# Altium PCB RADAR_D79_POWER_24V_v0.8.0_R9_NATIVE.PcbDoc (part 1 of 7)
Units mil, origin at the board's own origin, x right, y up, seen from the top; angles counter-clockwise.
Board outline 3110.24 x 3110.24 mil, 8 copper layers (Top Layer, GND1, SIG1, PWR1, PWR2, SIG2, GND2, Bottom Layer), stack 55.2 mil thick; 304 components, 269 nets, 1408 pads, 1366 vias.
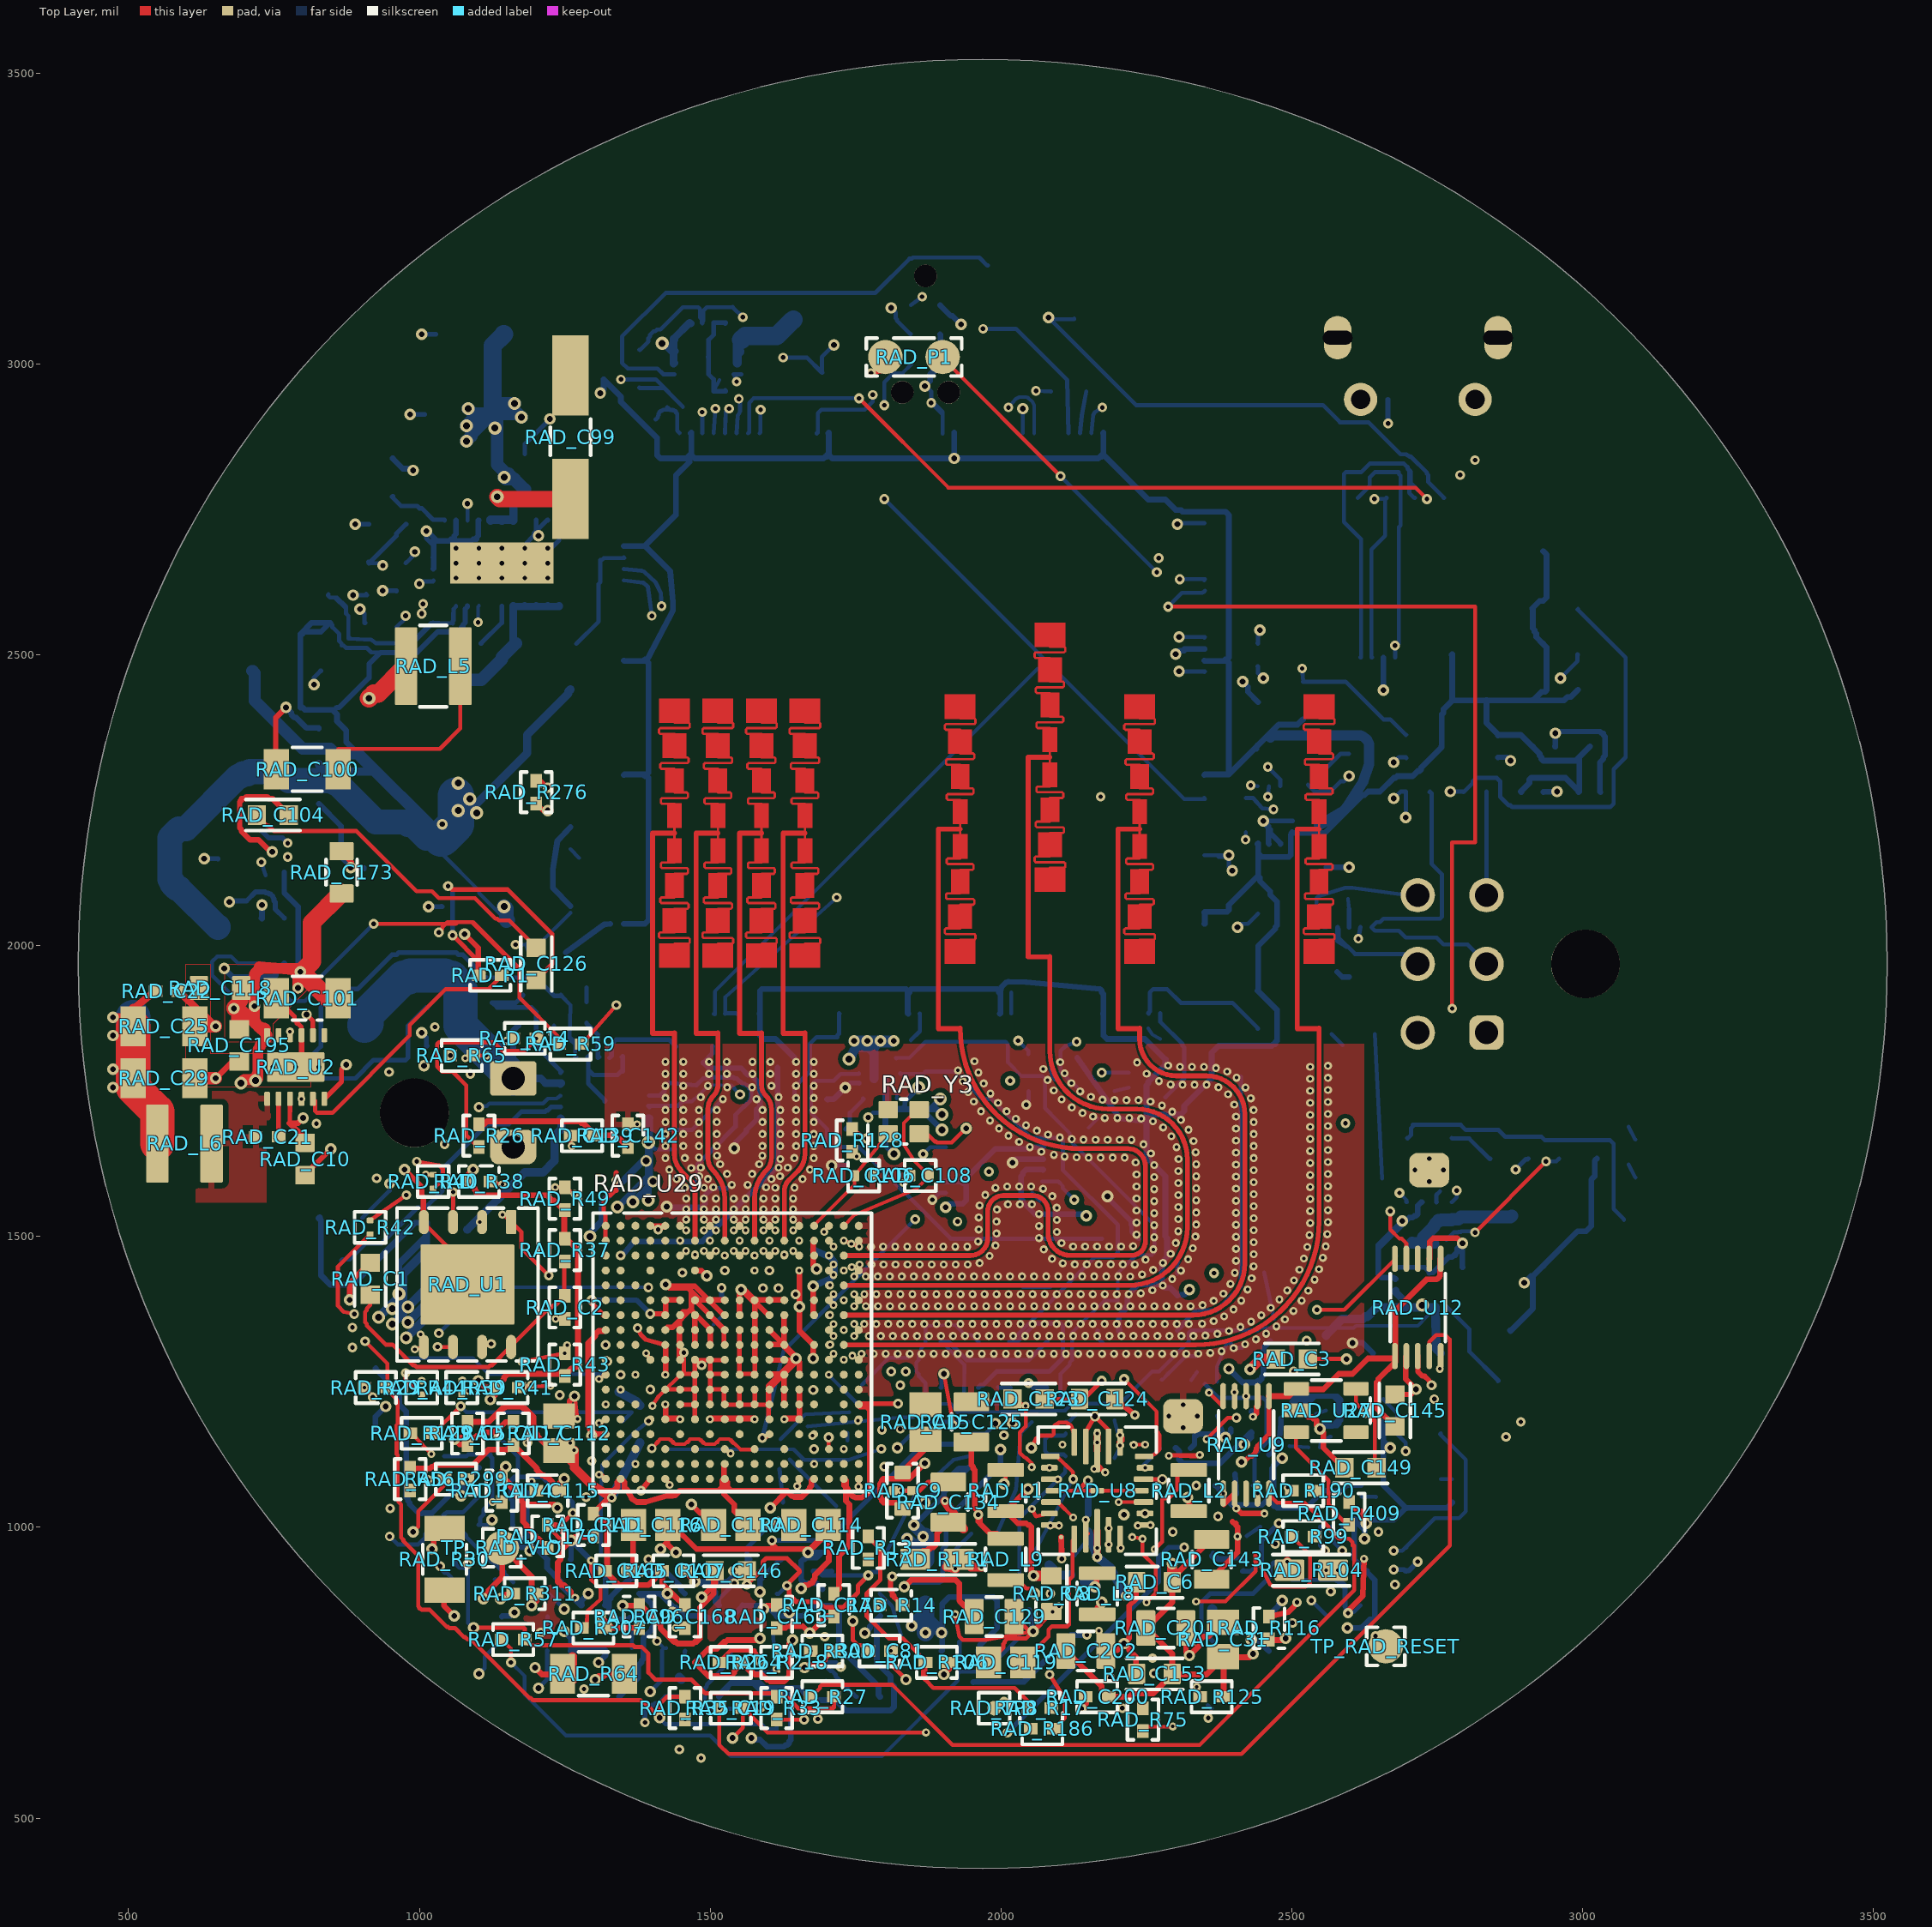
[diagram p0: Top Layer view]
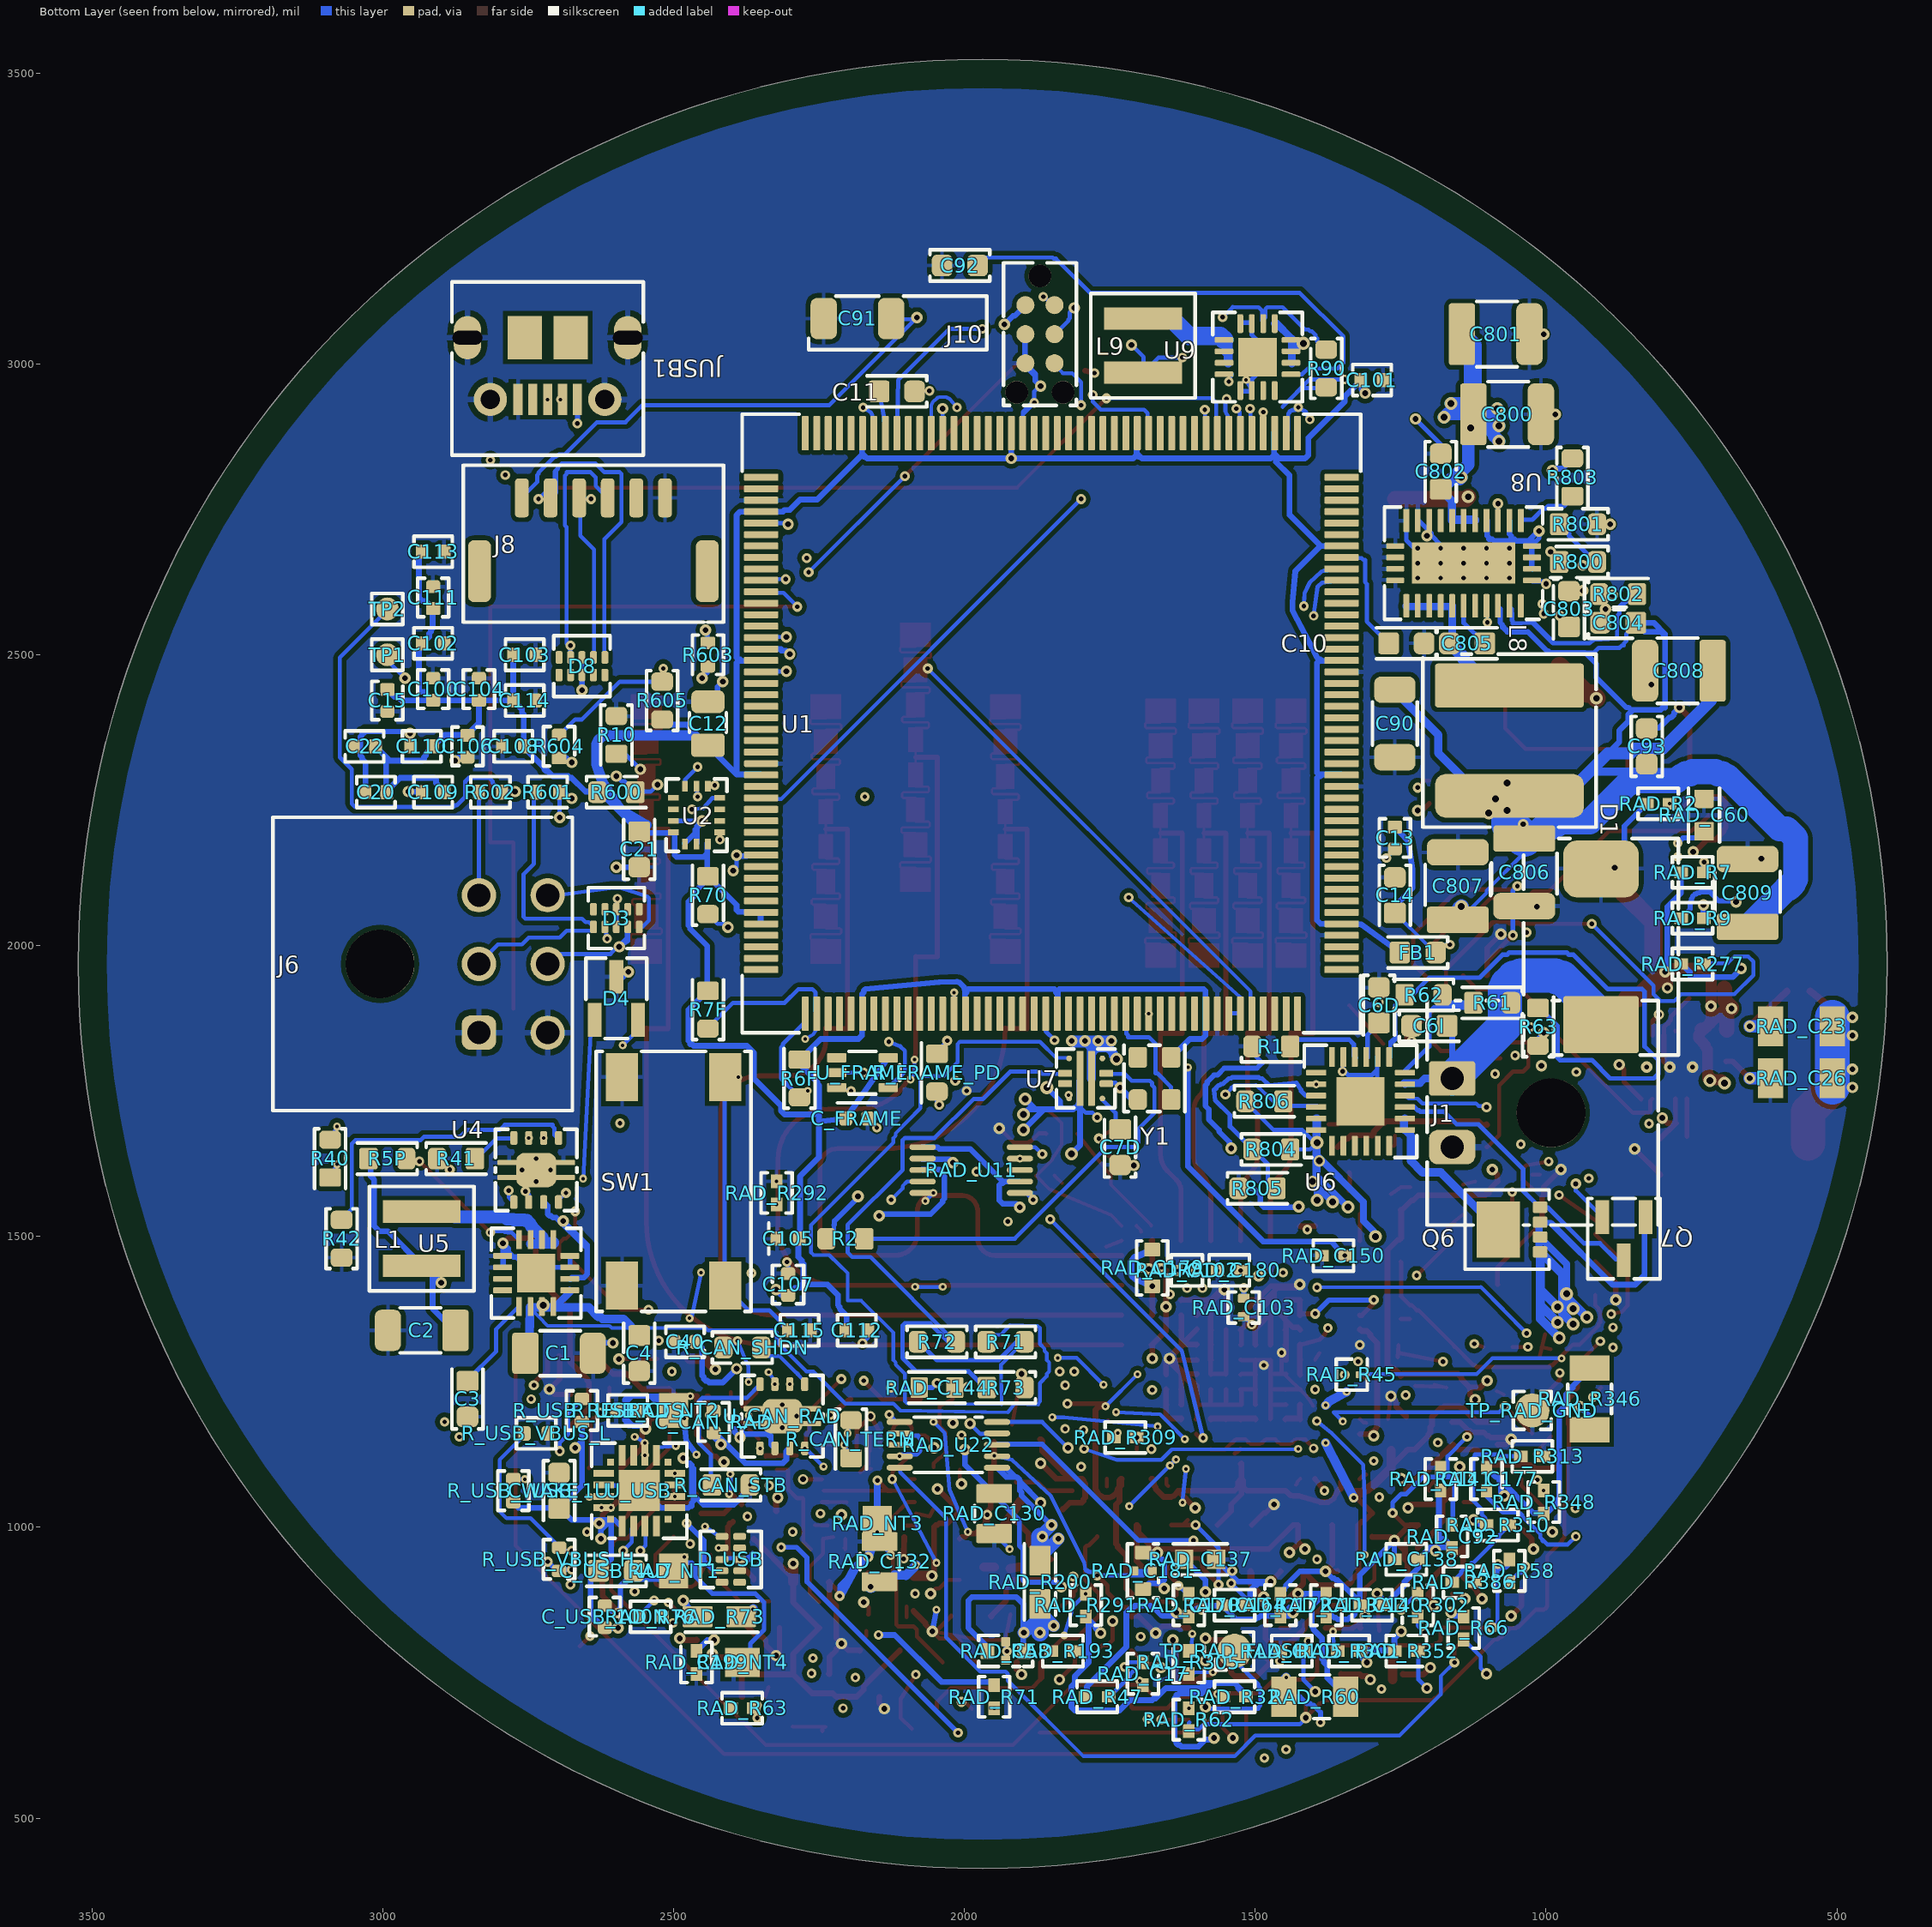
[diagram p1: Bottom Layer view, seen from below]
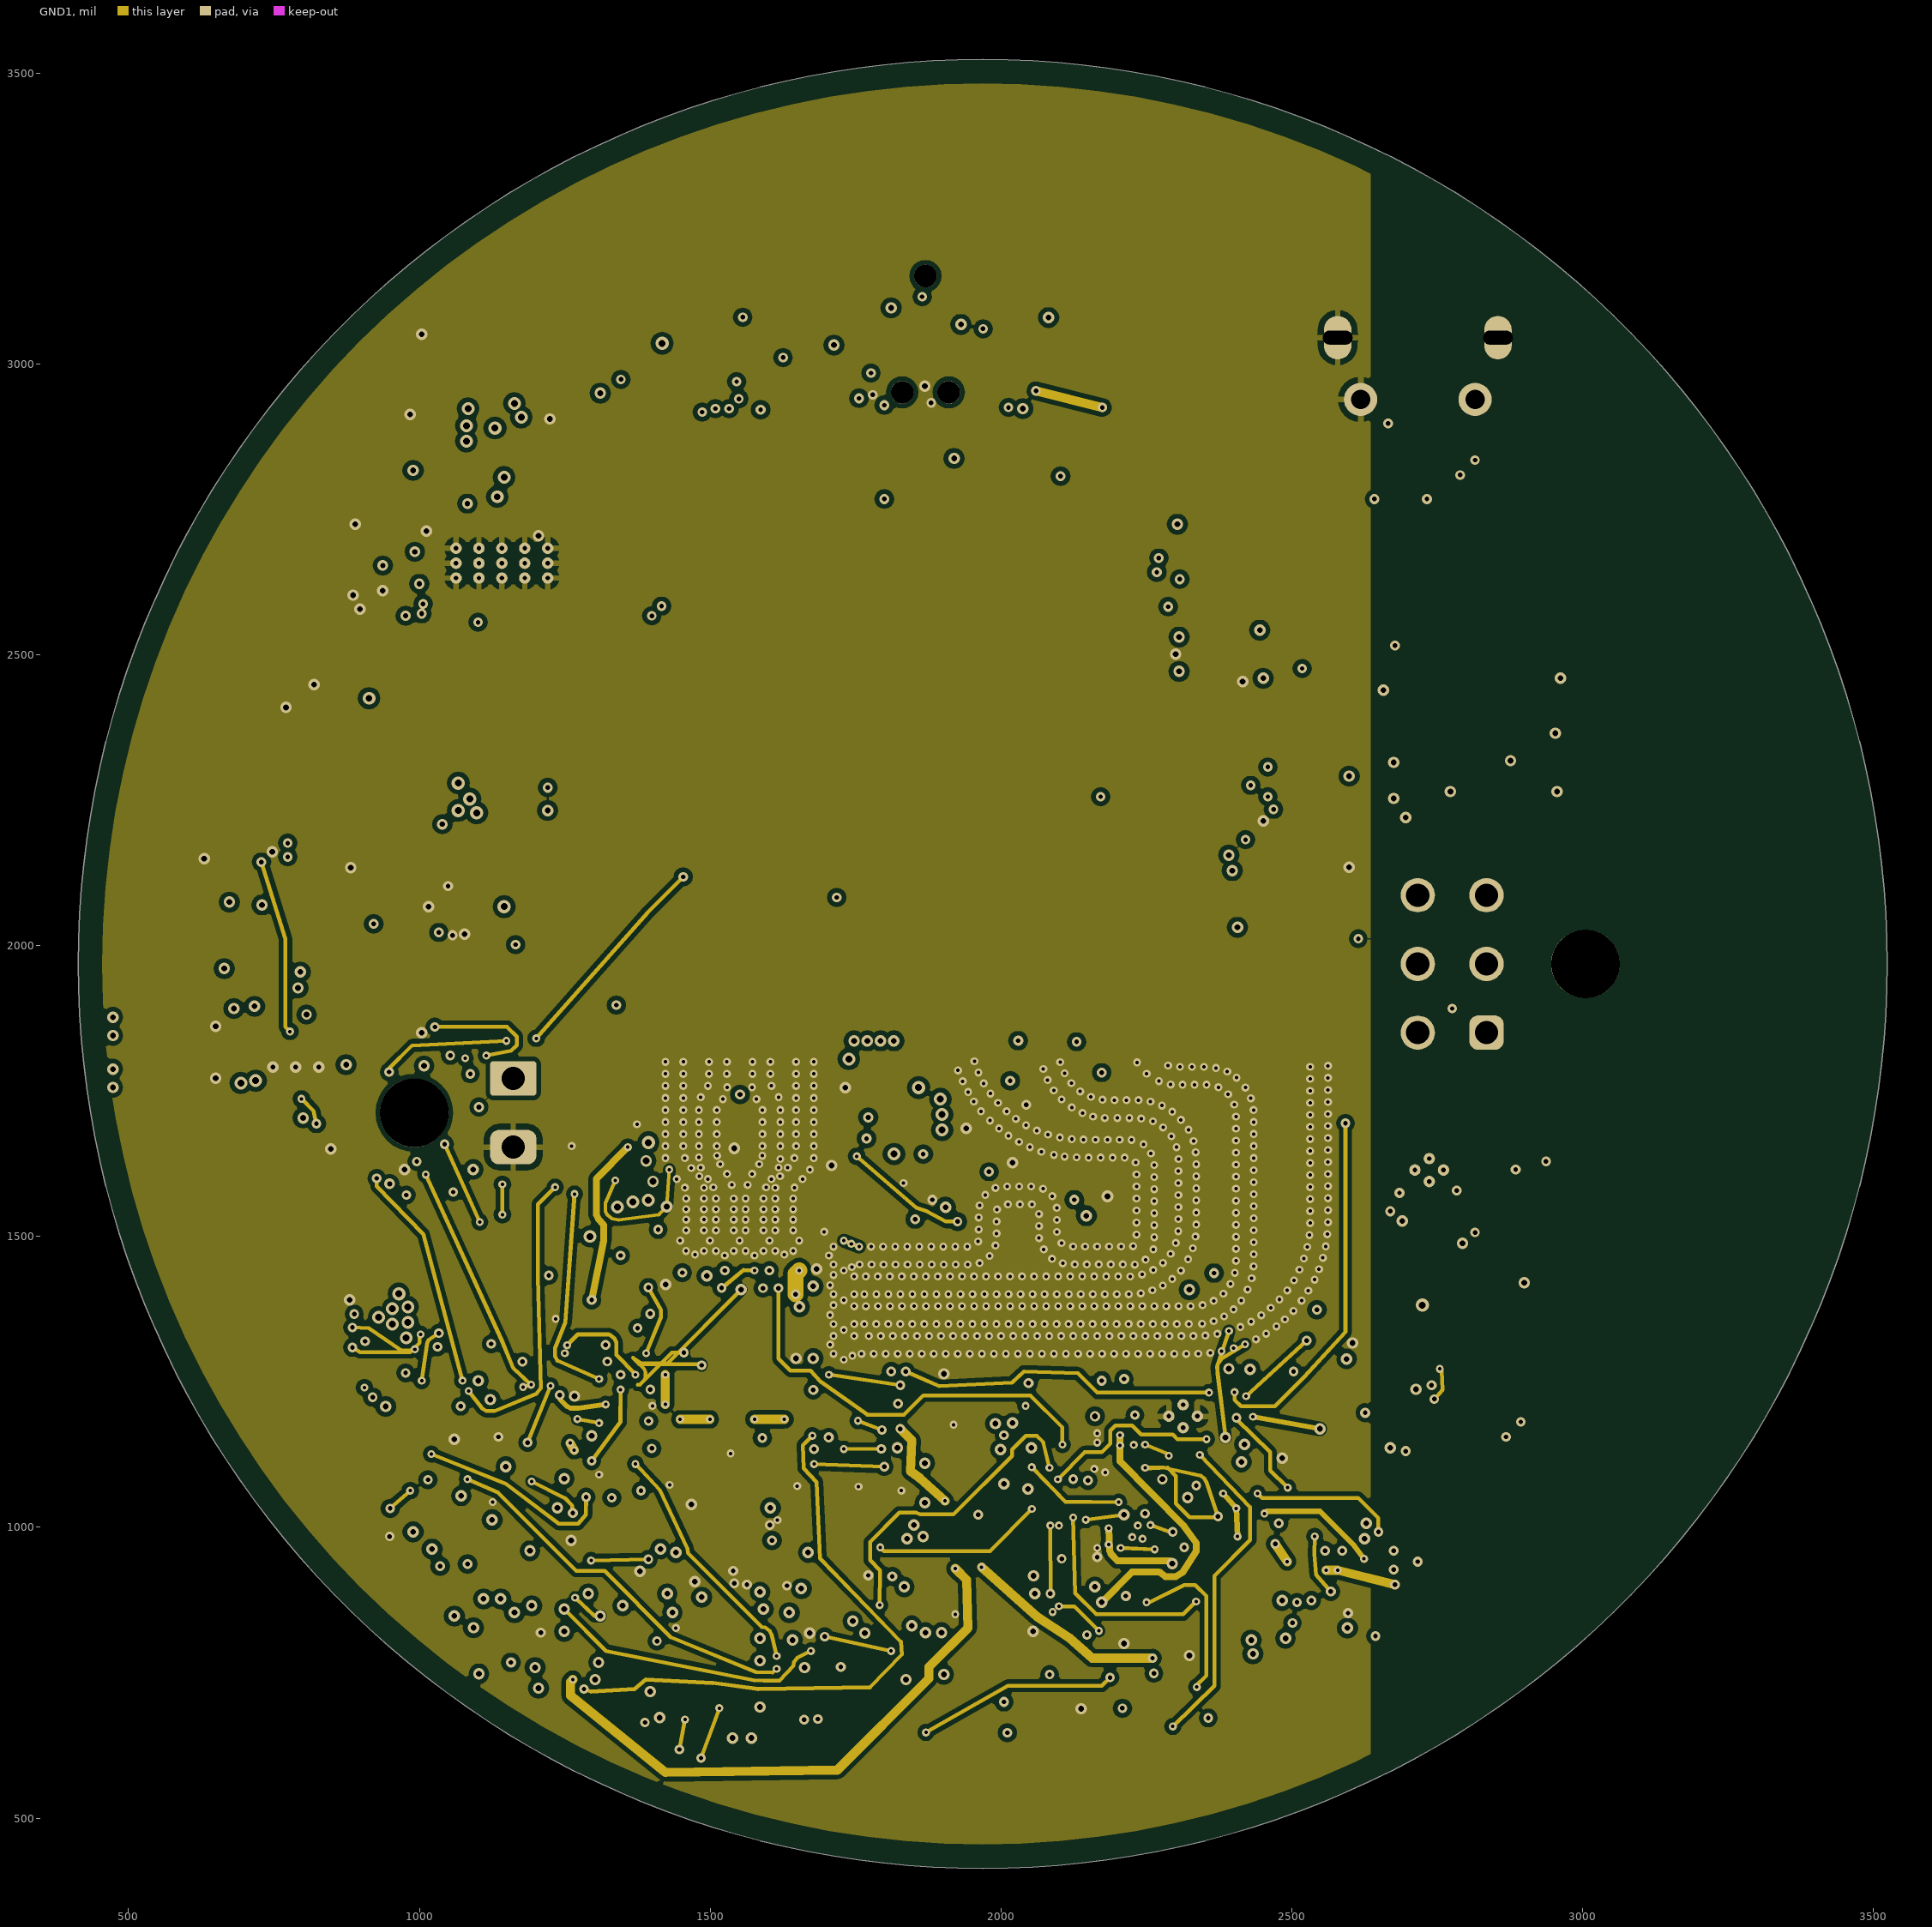
[diagram p2: GND1]
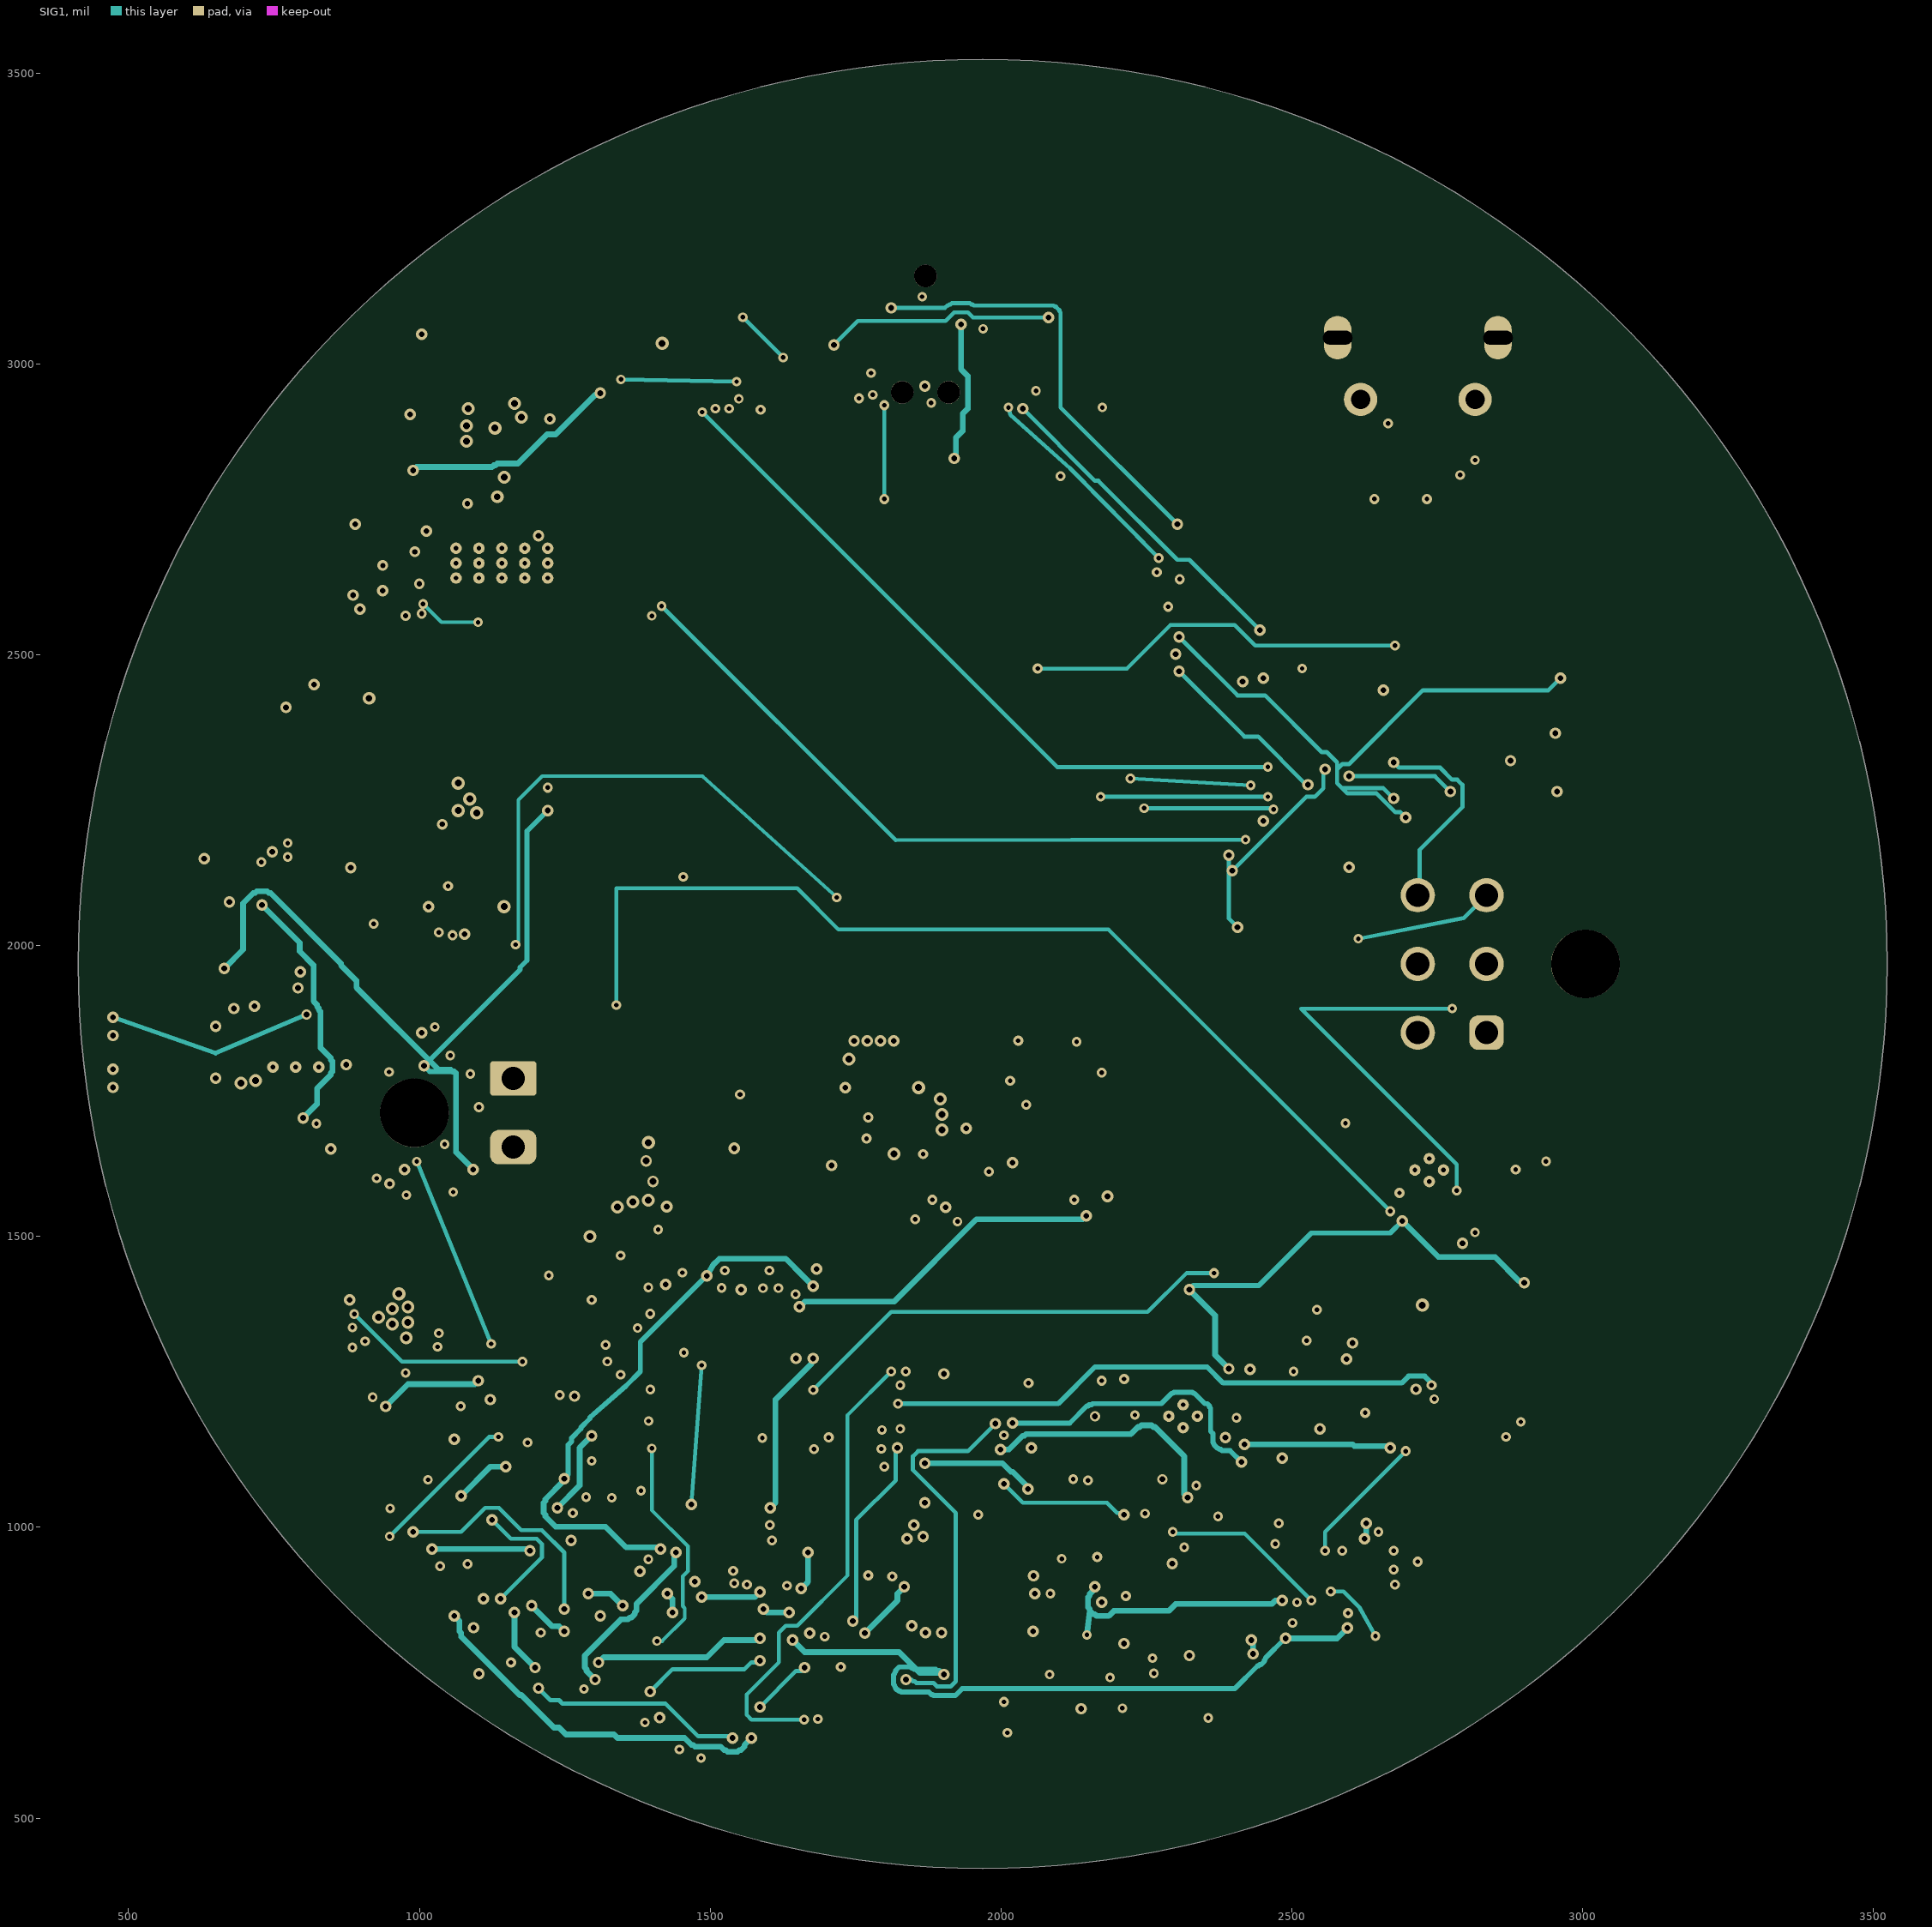
[diagram p3: SIG1]
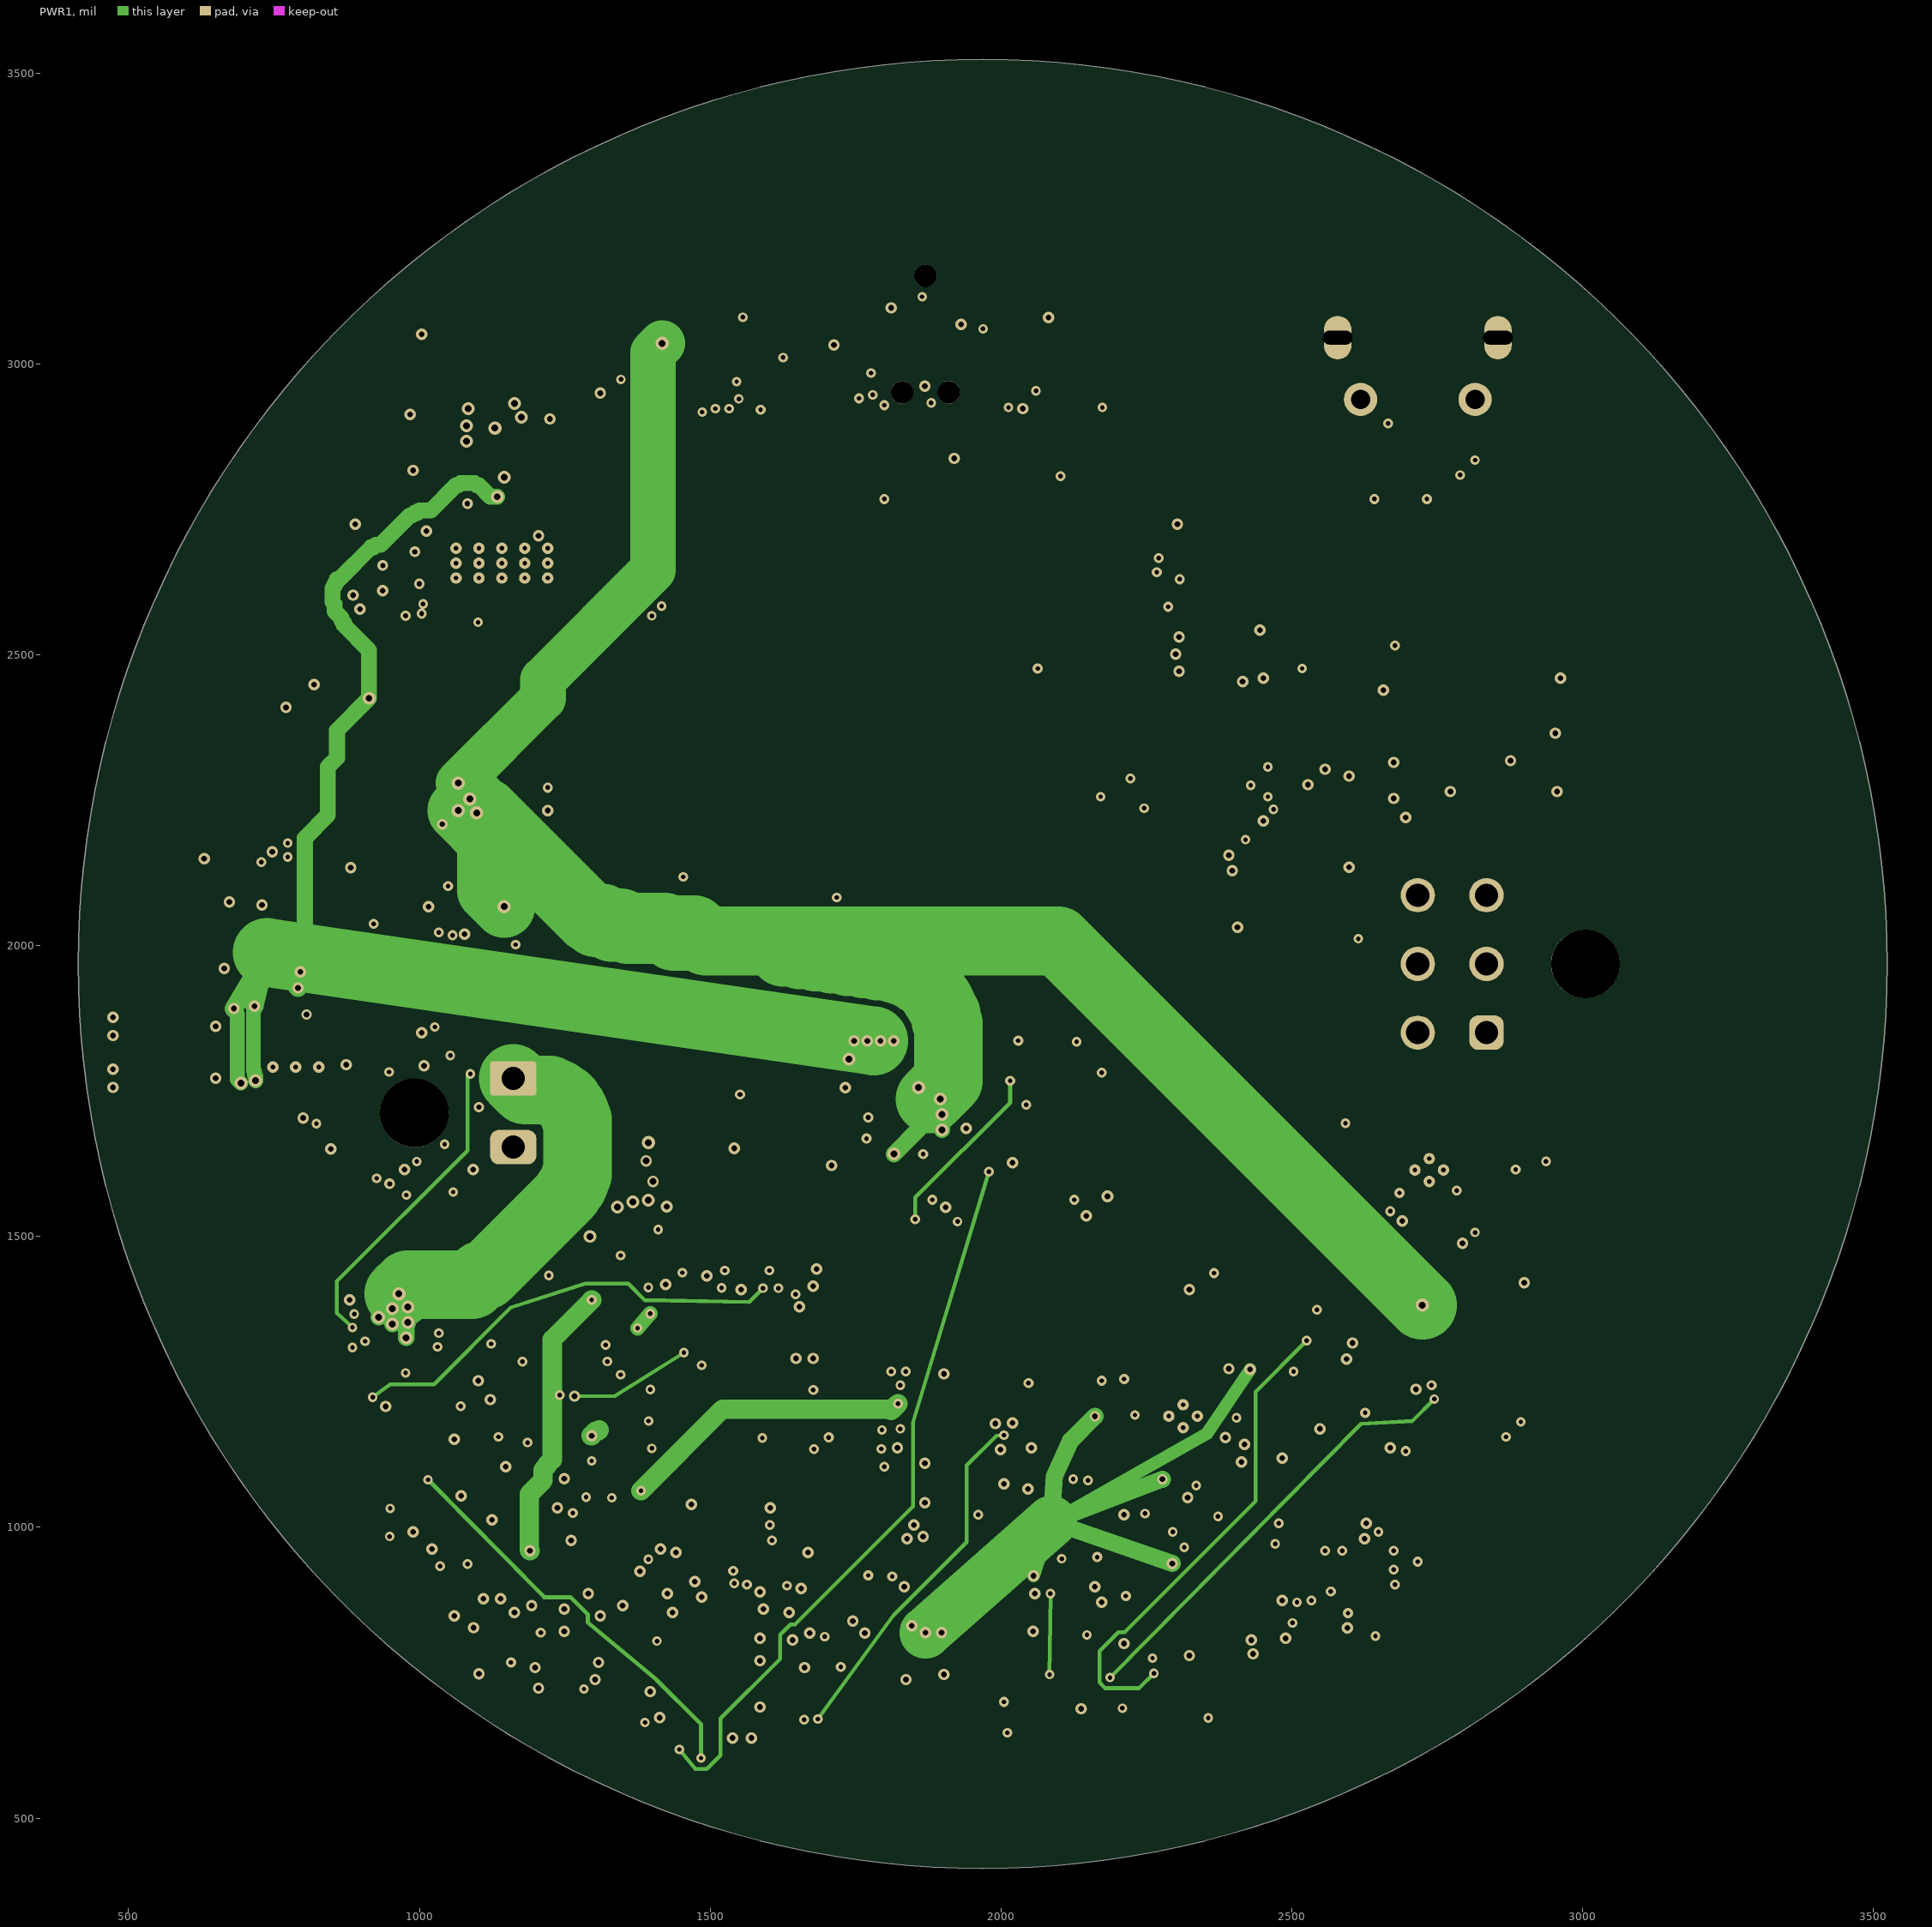
[diagram p4: PWR1]
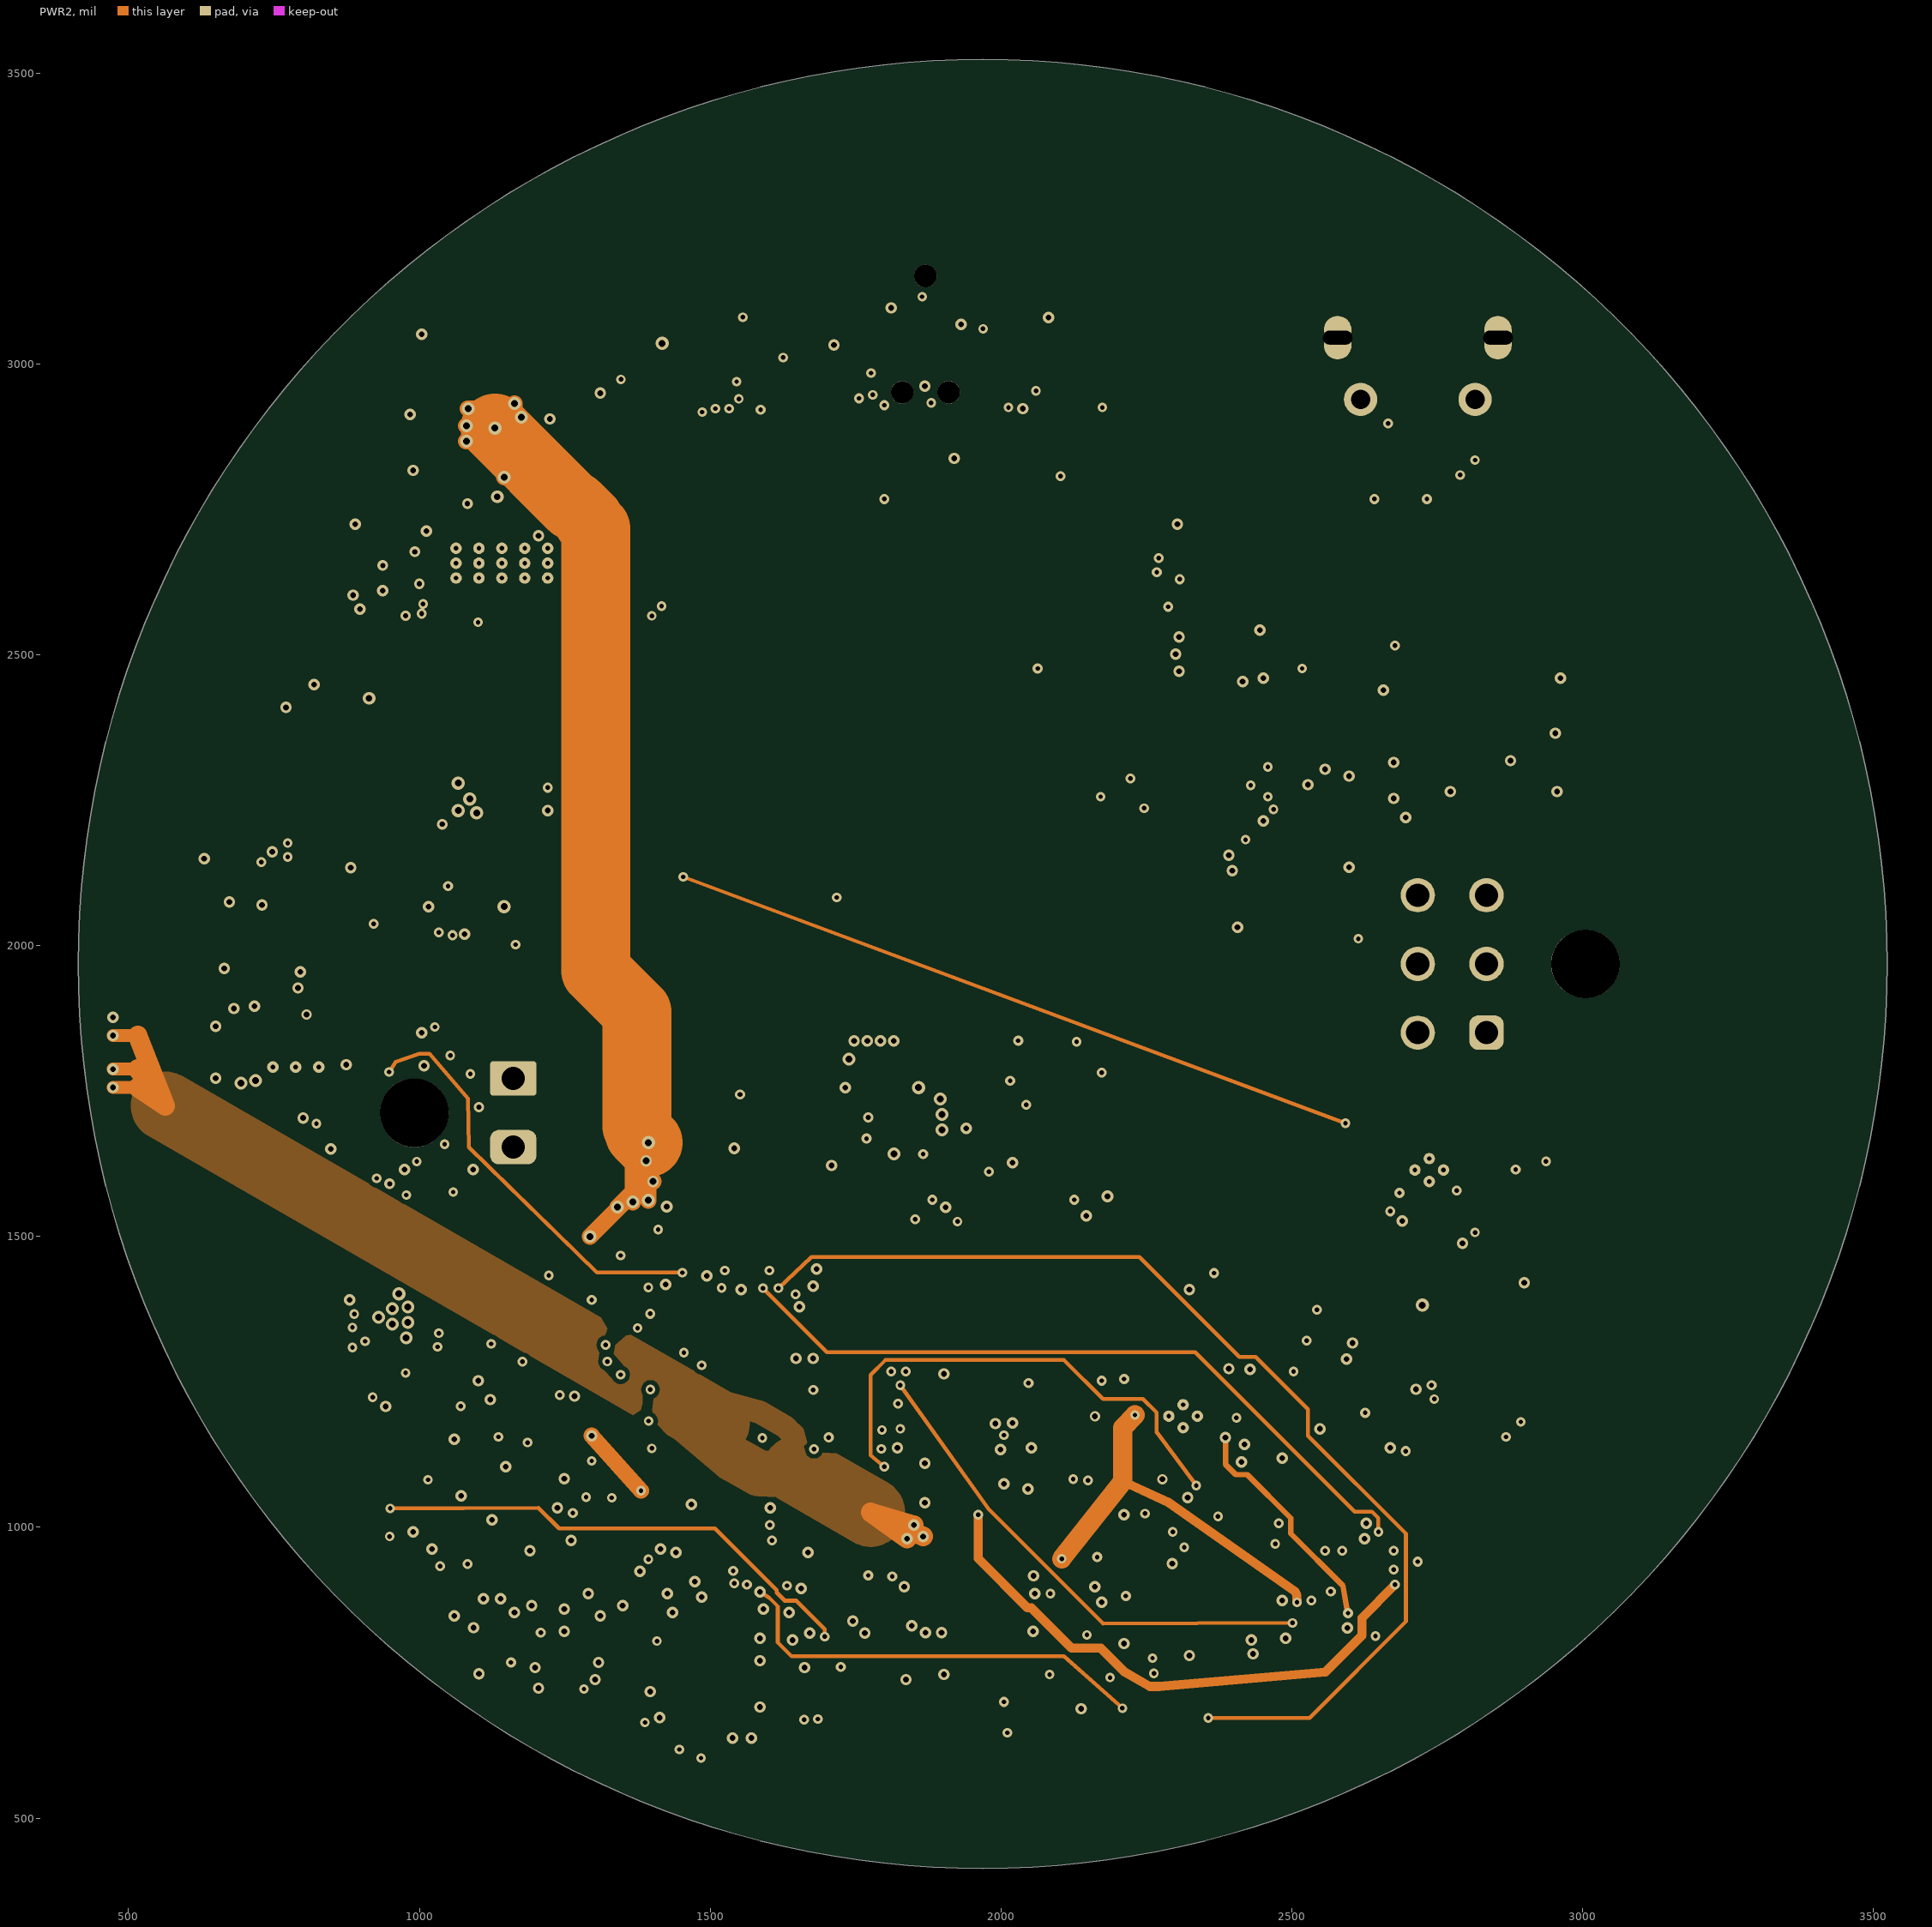
[diagram p5: PWR2]
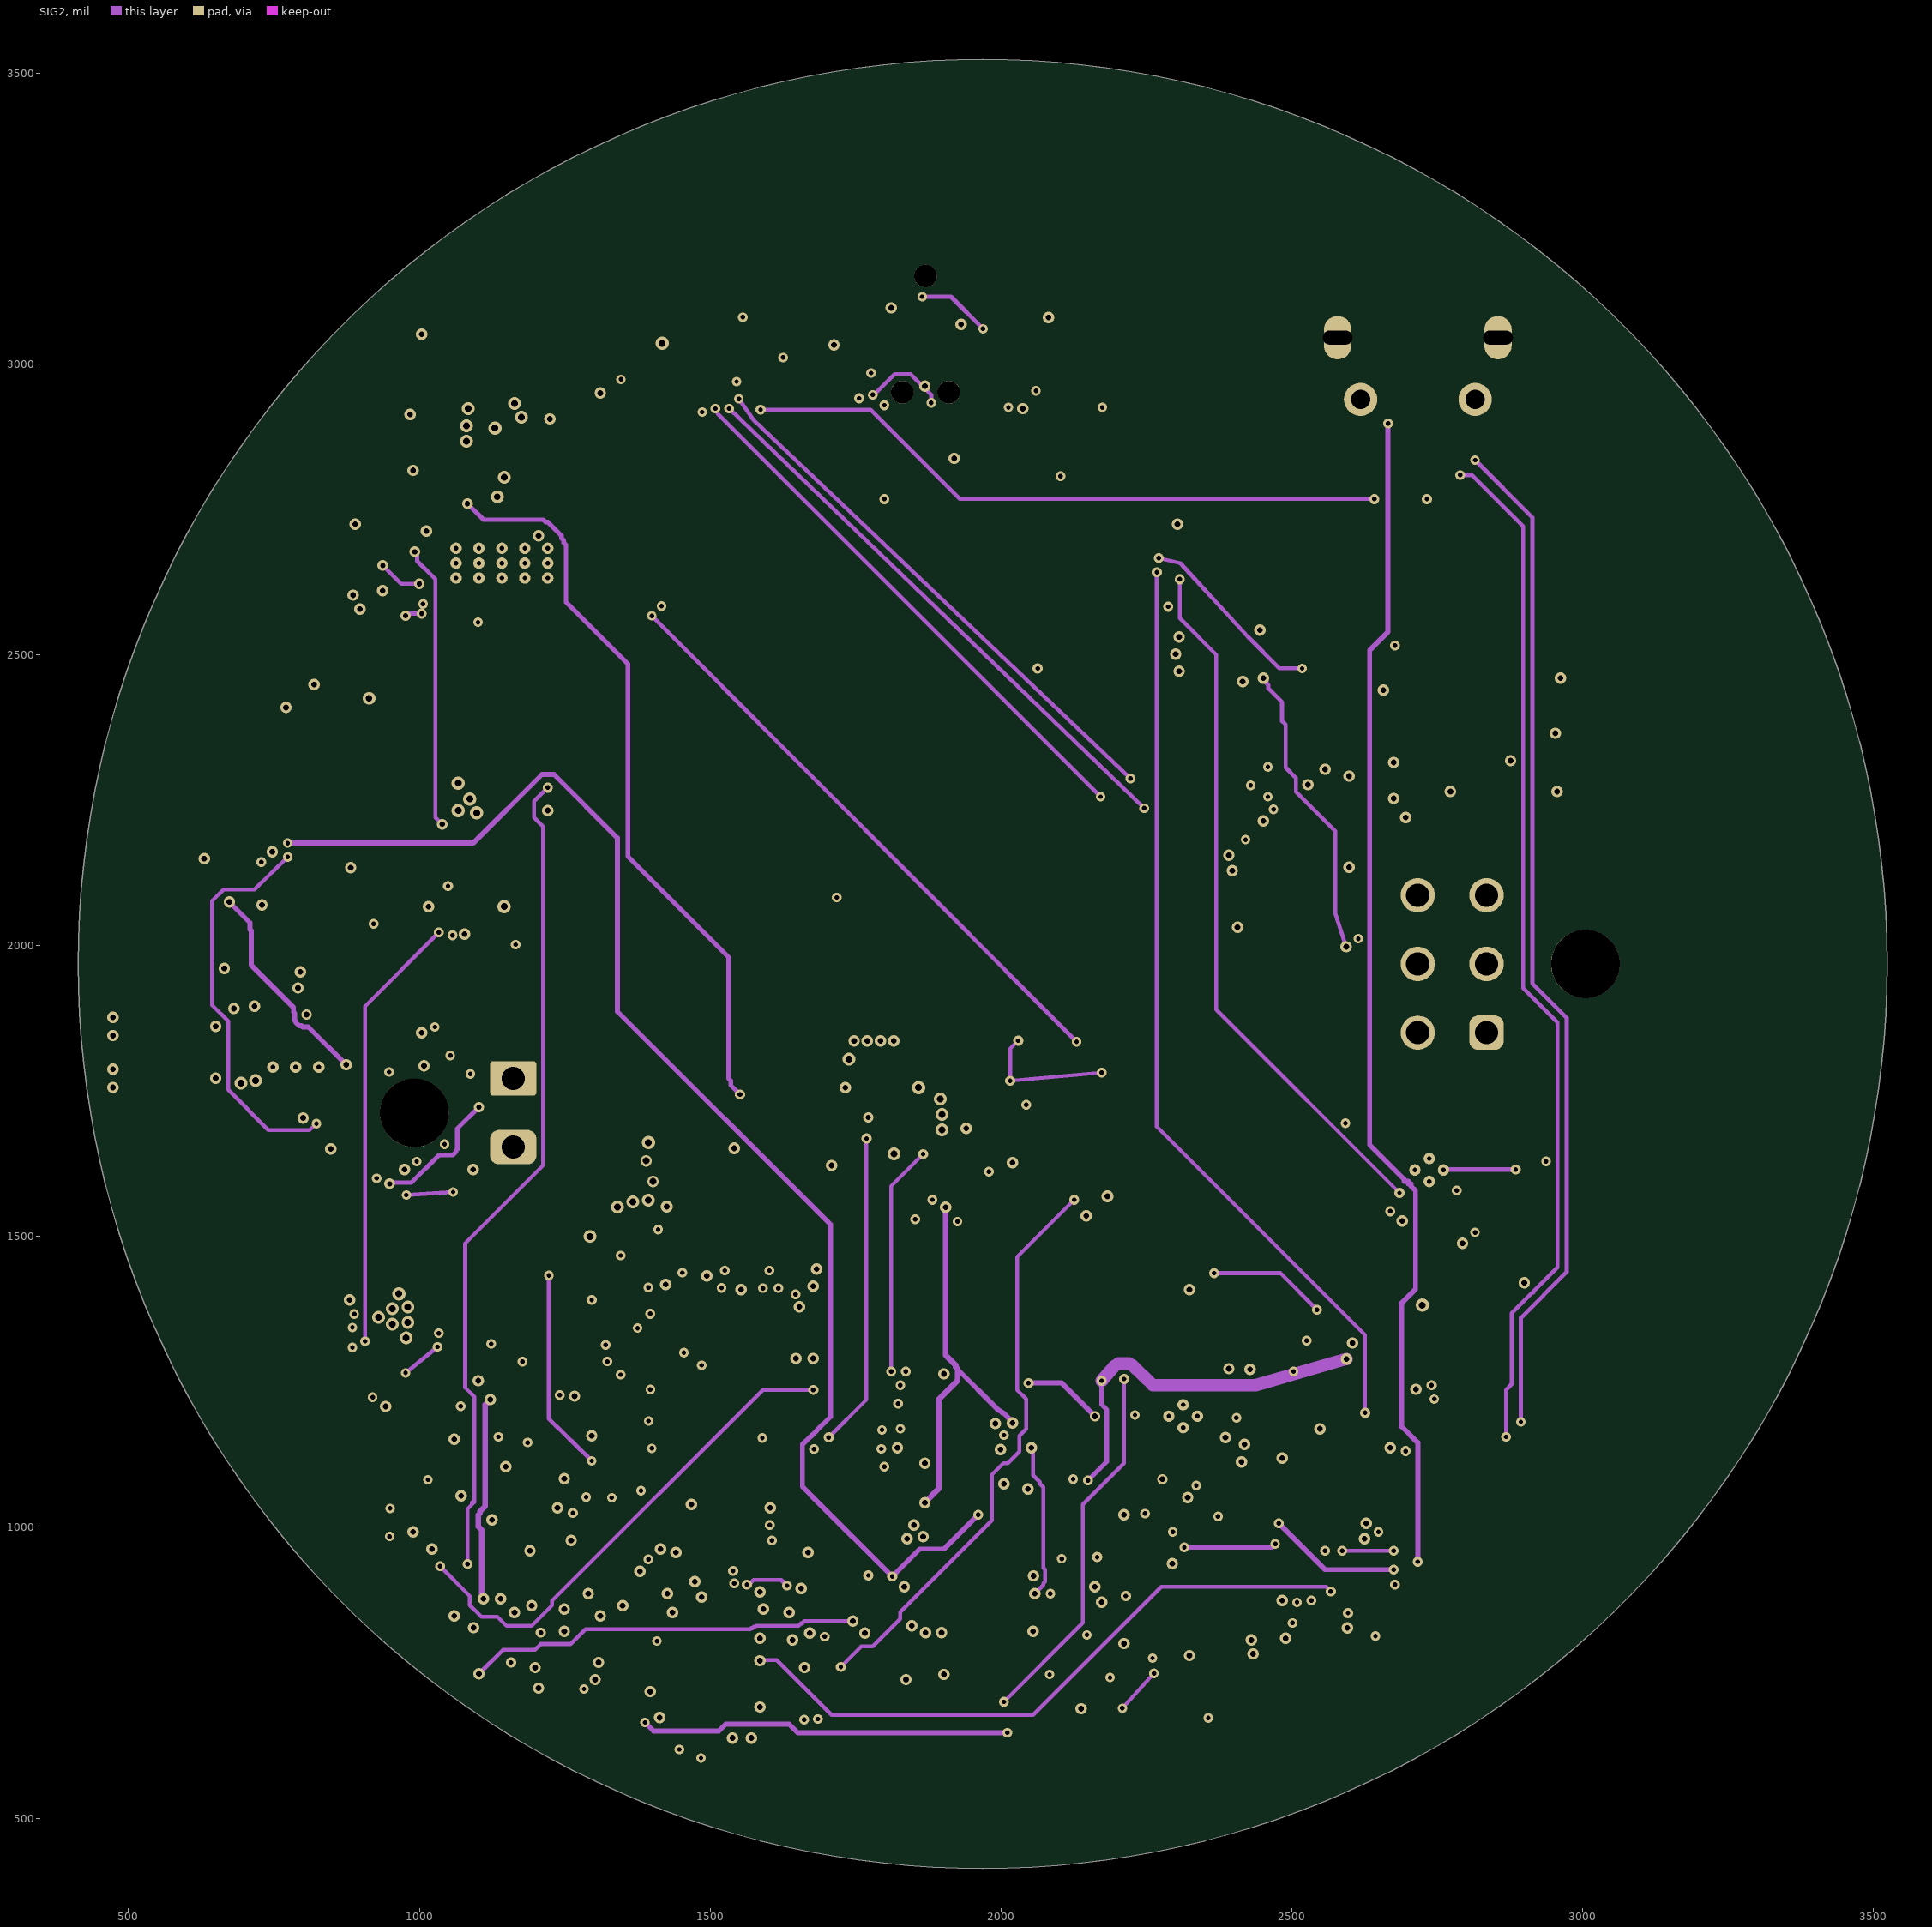
[diagram p6: SIG2]
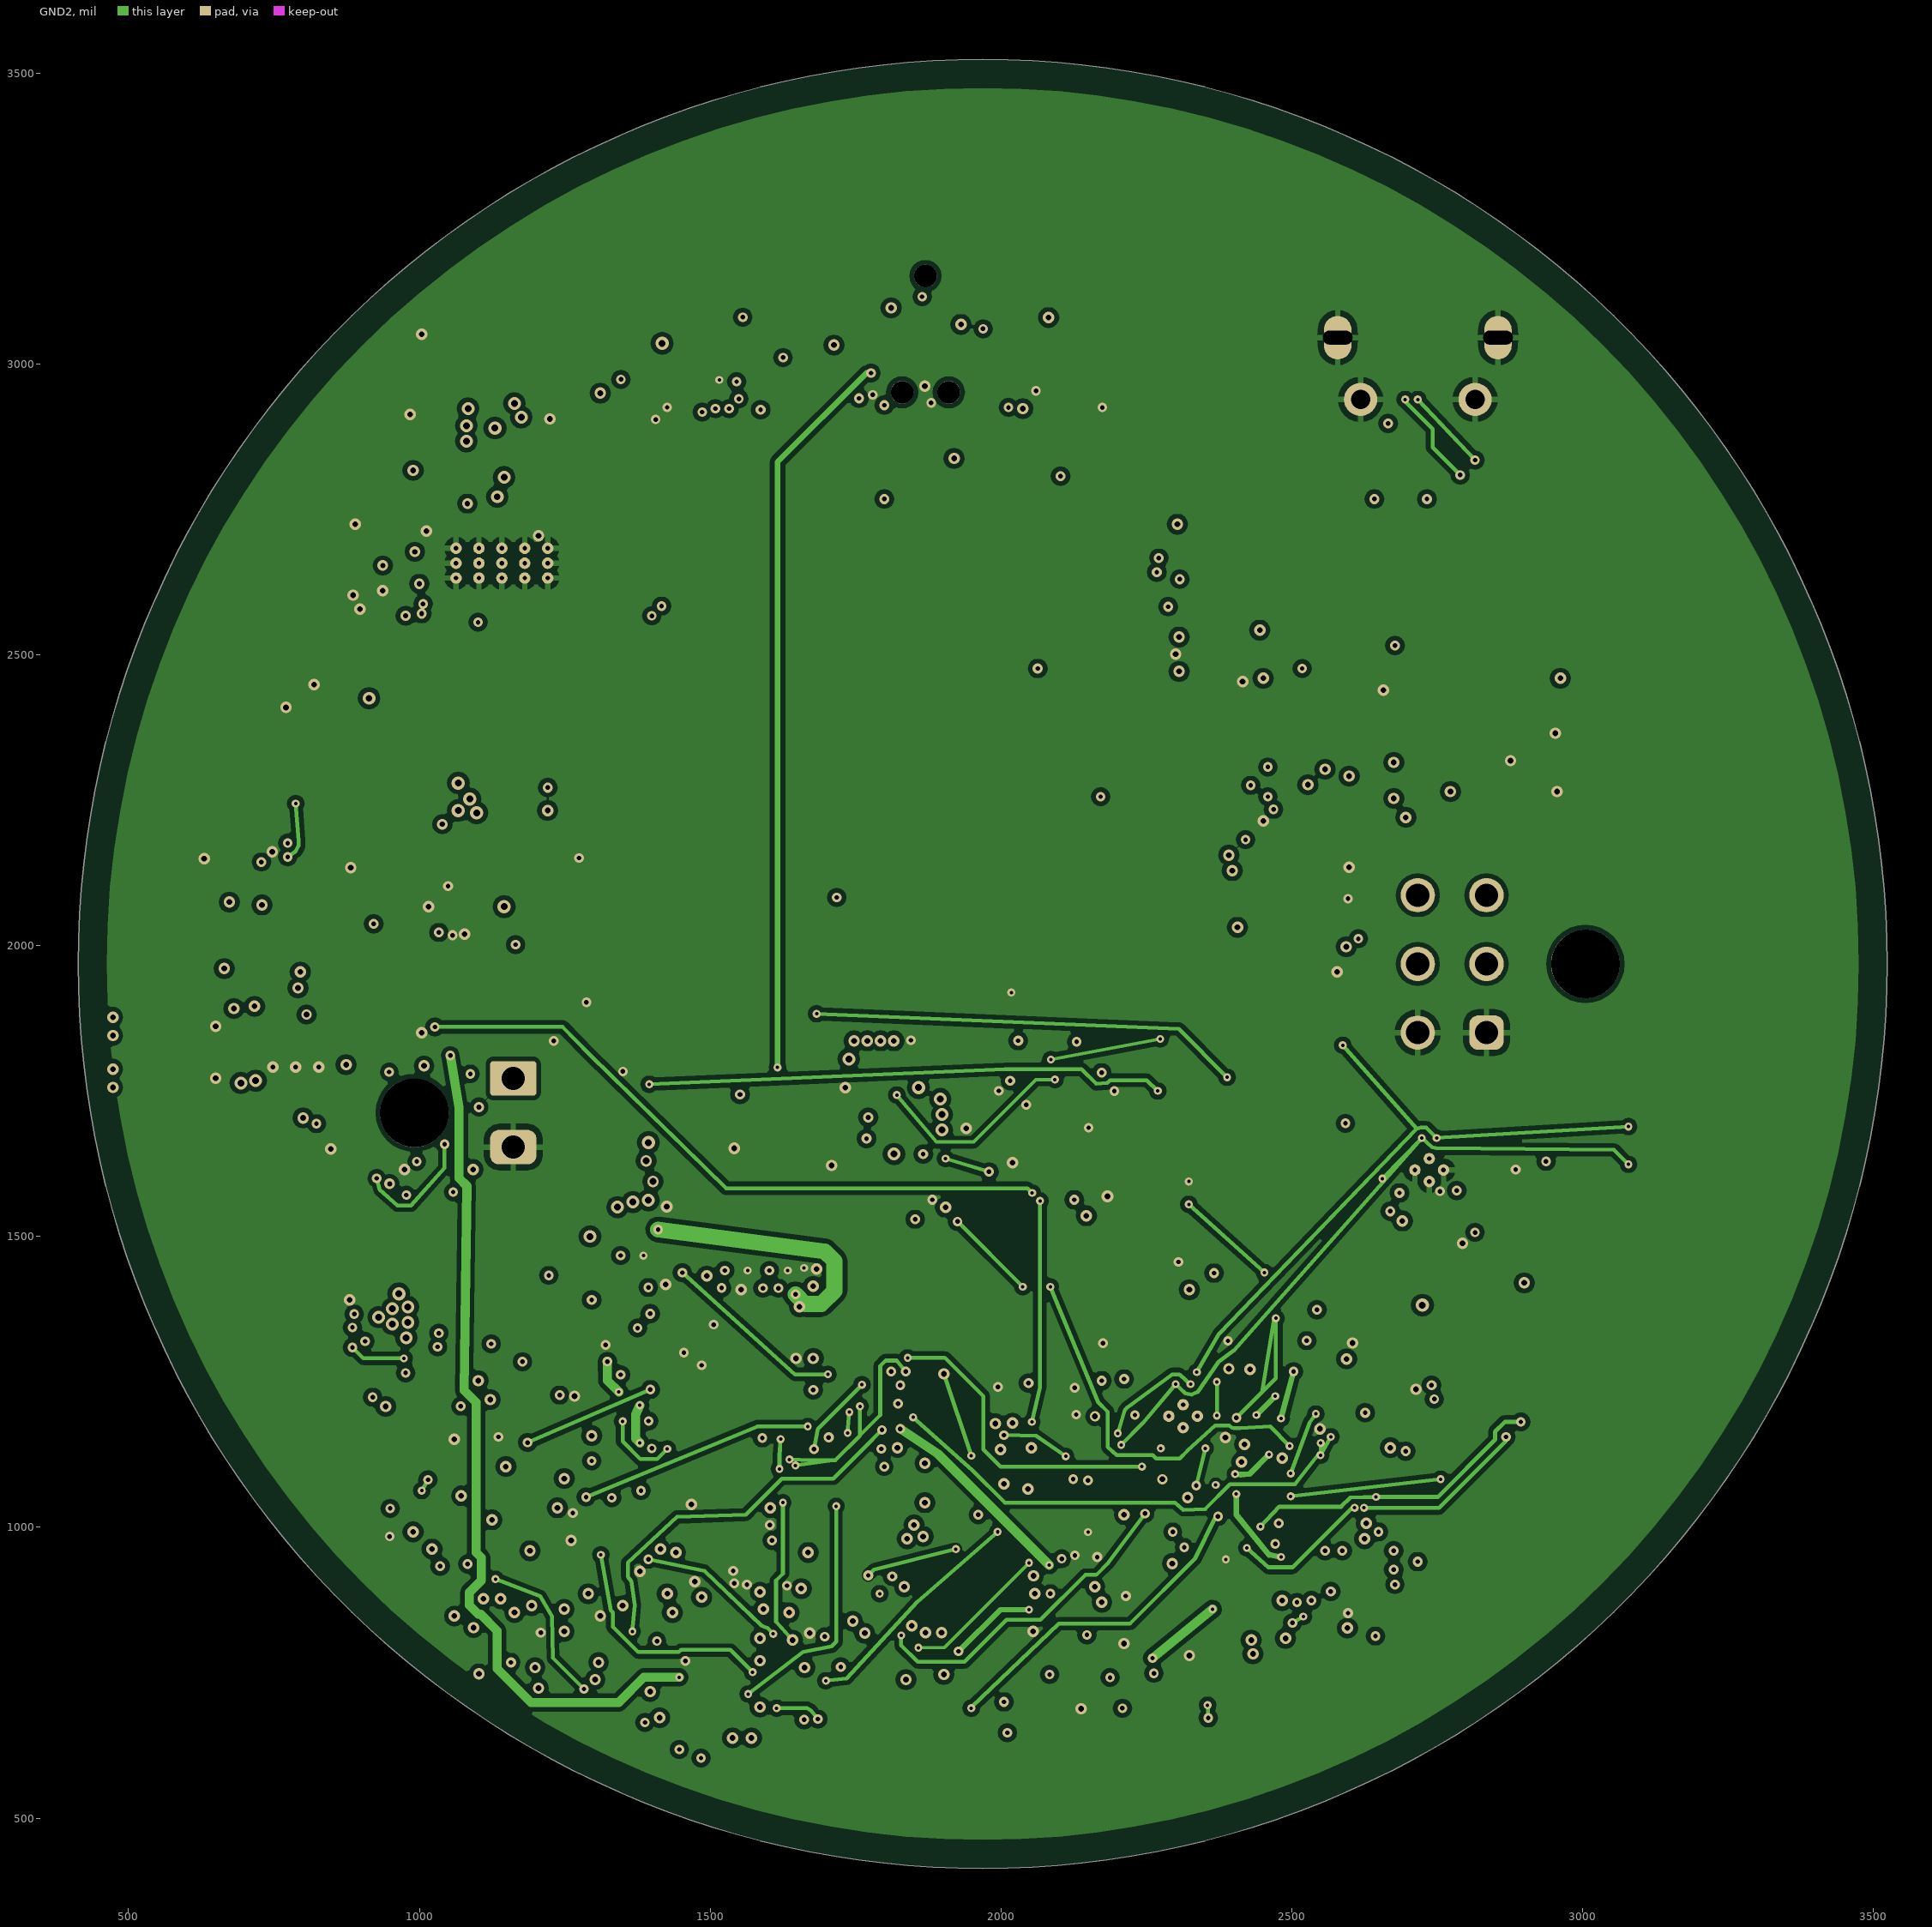
[diagram p7: GND2]

## Layer stack, top to bottom
Top Solder: solder mask 0.8, Solder Resist, Dk 3.5
Top Layer: signal copper 1.6
Dielectric 1: prepreg 5, RO3003, Dk 3
GND1: signal copper 1.4
Dielectric 2: core 5, FR-4 High Tg, Dk 4.04
SIG1: signal copper 0.7
Dielectric 3: prepreg 10, FR-4 High Tg, Dk 4.04
PWR1: signal copper 1.4
Dielectric 4: prepreg 5, FR-4 High Tg, Dk 4.04
PWR2: signal copper 1.4
Dielectric 5: prepreg 10, FR-4 High Tg, Dk 4.04
SIG2: signal copper 0.7
Dielectric 6: core 5, FR-4 High Tg, Dk 4.04
GND2: signal copper 1.4
Dielectric 7: prepreg 5, FR-4 High Tg, Dk 4.04
Bottom Layer: signal copper 1.6
Bottom Solder: solder mask 0.8, Solder Resist, Dk 3.5

## Board outline
1968.5,413.39 cw(c1968.5,1968.5) 413.39,1968.5 cw(c1968.5,1968.5) 1968.5,3523.62 cw(c1968.5,1968.5) 3523.62,1968.5 cw(c1968.5,1968.5)

## Design rules (kind name [scope] priority, off if disabled: settings)
Clearance PROC194A_RF_TOP_TO_GND_VIA [OnLayer('Top Layer') AND (IsTrack OR IsArc) AND (InNet('TI_TX1') OR InNet('TI_TX2') OR InNet('TI_TX3') OR InNet('TI_TX4') OR InNet('TI_RX1') OR InNet('TI_RX2') OR InNet('TI_RX3') OR InNet('TI_RX4')) vs IsVia AND InNet('GND')] p1: gap=10 ignorepadtopadclearanceinfootprint=FALSE except(4: Arc-Via Arc-Hole Track-Via Track-Hole) // TI PROC194A RF_Via matrix, track and arc to GND via only
Clearance PROC194A_RF_Coplanar_Gap [OnLayer('Top Layer') AND (IsTrack OR IsArc) AND (InNet('TI_TX1') OR InNet('TI_TX2') OR InNet('TI_TX3') OR InNet('TI_TX4') OR InNet('TI_RX1') OR InNet('TI_RX2') OR InNet('TI_RX3') OR InNet('TI_RX4')) vs InNamedPolygon('GND_COPLANAR_FEED_REFERENCE')] p2: gap=10 ignorepadtopadclearanceinfootprint=FALSE except(3.78: Track-Poly; 3.94: Arc-Poly) // TI PROC194A clearances, feed tracks and arcs to named coplanar ground
Clearance PROC194A_RF_TO_RF_CLEARANCE [OnLayer('Top Layer') AND (IsTrack OR IsArc) AND (InNet('TI_RX1') OR InNet('TI_RX2') OR InNet('TI_RX3') OR InNet('TI_RX4') OR InNet('TI_TX1') OR InNet('TI_TX2') OR InNet('TI_TX3') OR InNet('TI_TX4')) vs OnLayer('Top Layer') AND (IsTrack OR IsArc) AND (InNet('TI_RX1') OR InNet('TI_RX2') OR InNet('TI_RX3') OR InNet('TI_RX4') OR InNet('TI_TX1') OR InNet('TI_TX2') OR InNet('TI_TX3') OR InNet('TI_TX4'))] p3: gap=4.5 ignorepadtopadclearanceinfootprint=FALSE // Controlled antenna-array inter-channel spacing
Clearance Hybrid_35um_Polygon_Clearance [InPolygon] p4: gap=7.87 ignorepadtopadclearanceinfootprint=FALSE
Clearance [All] p5: gap=5.91 ignorepadtopadclearanceinfootprint=FALSE
DiffPairsRouting [All] p1: maxlimit=10 minlimit=10 mostfreqgap=10 toplayer_minwidth=15 toplayer_maxwidth=15 toplayer_prefwidth=15 midlayer2_minwidth=15 midlayer2_maxwidth=15 midlayer2_prefwidth=15 midlayer3_minwidth=15 midlayer3_maxwidth=15 midlayer3_prefwidth=15 midlayer5_minwidth=15 midlayer5_maxwidth=15 midlayer5_prefwidth=15 midlayer6_minwidth=15 midlayer6_maxwidth=15 midlayer6_prefwidth=15 midlayer7_minwidth=15 midlayer7_maxwidth=15 midlayer7_prefwidth=15 midlayer8_minwidth=15 midlayer8_maxwidth=15 midlayer8_prefwidth=15 bottomlayer_minwidth=15 bottomlayer_maxwidth=15 bottomlayer_prefwidth=15 substack1={9319A519-0D26-40B3-8AF8-C4998BECF1C7} toplayer_{9319a519-0d26-40b3-8af8-c4998becf1c7}_minwidth=15 toplayer_{9319a519-0d26-40b3-8af8-c4998becf1c7}_maxwidth=15 toplayer_{9319a519-0d26-40b3-8af8-c4998becf1c7}_prefwidth=15 midlayer2_{9319a519-0d26-40b3-8af8-c4998becf1c7}_minwidth=15 midlayer2_{9319a519-0d26-40b3-8af8-c4998becf1c7}_maxwidth=15 midlayer2_{9319a519-0d26-40b3-8af8-c4998becf1c7}_prefwidth=15 midlayer3_{9319a519-0d26-40b3-8af8-c4998becf1c7}_minwidth=15 midlayer3_{9319a519-0d26-40b3-8af8-c4998becf1c7}_maxwidth=15 midlayer3_{9319a519-0d26-40b3-8af8-c4998becf1c7}_prefwidth=15 midlayer5_{9319a519-0d26-40b3-8af8-c4998becf1c7}_minwidth=15 midlayer5_{9319a519-0d26-40b3-8af8-c4998becf1c7}_maxwidth=15 midlayer5_{9319a519-0d26-40b3-8af8-c4998becf1c7}_prefwidth=15 midlayer6_{9319a519-0d26-40b3-8af8-c4998becf1c7}_minwidth=15 midlayer6_{9319a519-0d26-40b3-8af8-c4998becf1c7}_maxwidth=15 midlayer6_{9319a519-0d26-40b3-8af8-c4998becf1c7}_prefwidth=15 midlayer7_{9319a519-0d26-40b3-8af8-c4998becf1c7}_minwidth=15 midlayer7_{9319a519-0d26-40b3-8af8-c4998becf1c7}_maxwidth=15 midlayer7_{9319a519-0d26-40b3-8af8-c4998becf1c7}_prefwidth=15 midlayer8_{9319a519-0d26-40b3-8af8-c4998becf1c7}_minwidth=15 midlayer8_{9319a519-0d26-40b3-8af8-c4998becf1c7}_maxwidth=15 midlayer8_{9319a519-0d26-40b3-8af8-c4998becf1c7}_prefwidth=15 bottomlayer_{9319a519-0d26-40b3-8af8-c4998becf1c7}_minwidth=15 bottomlayer_{9319a519-0d26-40b3-8af8-c4998becf1c7}_maxwidth=15 bottomlayer_{9319a519-0d26-40b3-8af8-c4998becf1c7}_prefwidth=15 maxuncoupledlength=500
HoleSize Connector_Mounting_NPTH [IsPad AND AsMils(Hole) > 100] p1: absolutevalues=TRUE maxlimit=120.08 minlimit=116.14 maxpercent=80.000 minpercent=20.000
HoleSize [All] p2: absolutevalues=TRUE maxlimit=100 minlimit=1 maxpercent=80.000 minpercent=20.000
HoleToHoleClearance [All] p1: gap=7.87 allowstackedmicrovias=TRUE
MinimumSolderMaskSliver [All] p1: minsoldermaskwidth=3.94
PolygonConnect GND_Vias_Direct_Return [IsVia AND InNet('GND')] p1: connectstyle=Direct reliefconductorwidth=10 reliefentries=4 polygonreliefangle="90 Angle" airgapwidth=10 // Solid connection of GND vias to reference and return polygons
PolygonConnect Bottom_GND_SMD_Thermal [IsPad AND OnLayer('Bottom Layer') AND InNet('GND') vs OnLayer('Bottom Layer')] p2: connectstyle=Relief reliefconductorwidth=6.69 reliefentries=4 polygonreliefangle="90 Angle" airgapwidth=7.87 // Bottom SMT ground thermal spokes
PolygonConnect Top_Digital_GND_SMD_Thermal [IsPad AND OnLayer('Top Layer') AND InNet('GND') vs IsNamedPolygon('GND_TOP_DIGITAL_RETURN')] p3: connectstyle=Relief reliefconductorwidth=6.69 reliefentries=4 polygonreliefangle="90 Angle" airgapwidth=7.87 // Top SMT ground thermal spokes outside RF feed and power switching zones
PolygonConnect [All] p4: connectstyle=Relief reliefconductorwidth=10 reliefentries=4 polygonreliefangle="90 Angle" airgapwidth=10
RoutingVias [All] p1: holewidth=9.84 width=19.68 viastyle="Through Hole" minholewidth=7.87 minwidth=15.75 maxholewidth=11.81 maxwidth=23.62
SilkToSilkClearance [All] p1: silktosilkclearance=3
SilkToSolderMaskClearance [IsPad] p1: minsilkscreentomaskgap=3 clearancetoexposedcopper=TRUE
SolderMaskExpansion [All] p1: expansion=0.98 istentingtop=FALSE
Width PROC194A_RF_WIDTH [OnLayer('Top Layer') AND (IsTrack OR IsArc) AND (InNet('TI_RX1') OR InNet('TI_RX2') OR InNet('TI_RX3') OR InNet('TI_RX4') OR InNet('TI_TX1') OR InNet('TI_TX2') OR InNet('TI_TX3') OR InNet('TI_TX4'))] p1: maxlimit=8.4 minlimit=4 preferedwidth=4 substack1={9319A519-0D26-40B3-8AF8-C4998BECF1C7} // Calculated 78.5 GHz antenna microstrip widths on RO3003
Width [All] p2: maxlimit=157.48 minlimit=5.91 preferedwidth=7.09 substack1={9319A519-0D26-40B3-8AF8-C4998BECF1C7}
24 further rules are at their usual default settings.

## Components (designator, comment, footprint, x,y, rotation, side; value= is the part's Value field where it differs from the comment)
C1 "Comment" C_1206_3216Metric#1 2696.85,1299.21 r180 bottom
C2 "Comment" C_1206_3216Metric#1 2933.07,1338.58 r0 bottom
C3 "Comment" C_0603_1608Metric#1 2854.33,1220.47 r270 bottom
C4 "Comment" C_0603_1608Metric#1 2559.06,1299.21 r270 bottom
C6D "Comment" C_0603_1608Metric#1 1287.4,1897.64 r90 bottom
C6I "Comment" C_0603_1608Metric#1 1200.79,1862.2 r0 bottom
C7D "Comment" C_0603_1608Metric#1 1732.28,1653.54 r270 bottom
C10 "Comment" C_0603_1608Metric#1 1240.16,2519.68 r180 bottom
C11 "Comment" C_0603_1608Metric#1 2116.14,2952.76 r180 bottom
C12 "Comment" C_0805_2012Metric 2440.94,2381.89 r90 bottom
C13 "Comment" C_0402_1005Metric#1 1259.84,2185.04 r270 bottom
C14 "Comment" C_0603_1608Metric#1 1259.84,2086.61 r90 bottom
C15 "Comment" C_0402_1005Metric#1 2992.13,2421.26 r270 bottom
C20 "Comment" C_0402_1005Metric#1 3011.81,2263.78 r0 bottom
C21 "Comment" C_0603_1608Metric#1 2559.06,2165.35 r270 bottom
C22 "Comment" C_0402_1005Metric#1 3031.5,2342.52 r0 bottom
C40 "Comment" C_0402_1005Metric#2 2480.32,1318.9 r270 bottom
C90 "Comment" C_1206_3216Metric#2 1259.84,2381.89 r0 bottom
C91 "Comment" C_1206_3216Metric#3 1988.19,3051.18 r90 bottom
C92 "Comment" C_0603_1608Metric#2 2007.87,3169.29 r90 bottom
C93 "Comment" C_0603_1608Metric#2 826.77,2342.52 r180 bottom
C100 "Comment" C_0402_1005Metric#1 2913.39,2440.94 r90 bottom
C101 "Comment" C_0402_1005Metric#1 1299.21,2972.44 r180 bottom
C102 "Comment" C_0402_1005Metric#1 2913.39,2519.68 r180 bottom
C103 "Comment" C_0402_1005Metric#1 2755.91,2500 r180 bottom
C104 "Comment" C_0402_1005Metric#1 2834.65,2440.94 r90 bottom
C105 "Comment" C_0402_1005Metric#1 2303.15,1496.06 r0 bottom
C106 "Comment" C_0402_1005Metric#1 2854.33,2342.52 r270 bottom
C107 "Comment" C_0402_1005Metric#2 2303.15,1417.32 r0 bottom
C108 "Comment" C_0402_1005Metric#1 2775.59,2342.52 r0 bottom
C109 "Comment" C_0402_1005Metric#1 2913.39,2263.78 r0 bottom
C110 "Comment" C_0402_1005Metric#1 2933.07,2342.52 r0 bottom
C111 "Comment" C_0402_1005Metric#1 2913.39,2598.43 r90 bottom
C112 "Comment" C_0402_1005Metric#1 2185.04,1338.58 r180 bottom
C113 "Comment" C_0402_1005Metric#1 2913.39,2677.17 r180 bottom
C114 "Comment" C_0402_1005Metric#1 2755.91,2421.26 r180 bottom
C115 "Comment" C_0402_1005Metric#1 2283.46,1338.58 r180 bottom
C800 "Comment" C_1210_3225Metric 1066.93,2913.39 r180 bottom
C801 "Comment" C_1210_3225Metric 1086.61,3051.18 r180 bottom
C802 "Comment" C_0603_1608Metric#1 1181.1,2814.96 r90 bottom
C803 "Comment" C_0603_1608Metric#1 960.63,2578.74 r90 bottom
C804 "Comment" C_0603_1608Metric#1 875.98,2555.12 r0 bottom
C805 "Comment" C_0603_1608Metric#1 1135.83,2519.68 r0 bottom
C806 "Comment" C_1210_3225Metric 1037.4,2125.98 r270 bottom
C807 "Comment" C_1210_3225Metric 1151.57,2102.36 r90 bottom
C808 "Comment" C_1210_3225Metric 771.65,2472.44 r0 bottom
C809 "Comment" C_1210_3225Metric 653.54,2090.55 r90 bottom
C_CAN_RAD "Comment" C_0402_1005Metric#2 2431.1,1181.1 r0 bottom
C_FRAME "Comment" C_0402_1005Metric#2 2185.04,1702.76 r90 bottom
C_USB_1U "Comment" C_0603_1608Metric#1 2696.85,1062.99 r90 bottom
C_USB_4U7 "Comment" C_0603_1608Metric#1 2598.43,925.2 r180 bottom
C_USB_100N "Comment" C_0402_1005Metric#2 2618.11,846.46 r0 bottom
D1 "Comment" D_SMC 905.51,1998.03 r90 bottom
D3 "Comment" USON-10_2.5x1.0mm_P0.5mm 2598.43,2047.24 r90 bottom
D4 "Comment" SOT-23 2598.43,1909.45 r90 bottom
D8 "Comment" USON-10_2.5x1.0mm_P0.5mm 2657.48,2480.32 r270 bottom
D_USB "Comment" USON-10_2.5x1.0mm_P0.5mm 2401.57,944.88 r180 bottom
FB1 "Comment" L_0603_1608Metric 1220.47,1988.19 r180 bottom
J1 "Comment" Molex_43650-0200_RA_THT_2P 1161.42,1771.65 r270 bottom
J6 "Comment" Molex_43045-0600_RA_THT_6P 2834.65,1850.39 r90 bottom
J8 "Comment" JST_GH_SM06B-GHS-TB_1x06-1MP_P1.25mm_Horizontal 2637.8,2696.85 r270 bottom
J10 "Comment" TagConnect_TC2030_NL 1870.08,3051.18 r270 bottom
JUSB1 "Comment" CONN_105017-0001 2716.54,2992.13 r0 bottom
L1 "Comment" Coilcraft_XFL4020_4x4 2933.07,1496.06 r270 bottom
L8 "Comment" L_Coilcraft_XAL7070-XXX 1062.99,2352.36 r270 bottom
L9 "Comment" Coilcraft_XFL4020_4x4 1692.91,3031.5 r270 bottom
Q6 "Comment" VSON-8_3.3x3.3mm_P0.65mm_NexFET 1066.93,1511.81 r0 bottom
Q7 "Comment" SOT-23 866.14,1496.06 r270 bottom
R1 "Comment" R_0603_1608Metric#1 1472.44,1826.77 r0 bottom
R2 "Comment" R_0603_1608Metric#1 2204.72,1496.06 r0 bottom
R5P "Comment" R_0603_1608Metric#2 2992.13,1633.86 r0 bottom
R6F "Comment" R_0603_1608Metric#2 2283.46,1771.65 r90 bottom
R7F "Comment" R_0603_1608Metric#2 2440.94,1889.76 r90 bottom
R10 "Comment" R_0603_1608Metric#1 2598.43,2362.2 r90 bottom
R40 "Comment" R_0603_1608Metric#2 3090.55,1633.86 r270 bottom
R41 "Comment" R_0603_1608Metric#1 2874.02,1633.86 r0 bottom
R42 "Comment" R_0603_1608Metric#3 3070.87,1496.06 r0 bottom
R61 "Comment" R_0603_1608Metric#2 1092.52,1901.57 r0 bottom
R62 "Comment" R_0603_1608Metric#2 1210.63,1915.35 r0 bottom
R63 "Comment" R_0603_1608Metric#1 1013.78,1860.24 r270 bottom
R70 "Comment" R_0603_1608Metric#2 2440.94,2086.61 r90 bottom
R71 "Comment" R_0603_1608Metric#4 1929.13,1318.9 r180 bottom
R72 "Comment" R_0603_1608Metric#4 2047.24,1318.9 r180 bottom
R73 "Comment" R_0603_1608Metric#1 1929.13,1240.16 r180 bottom
R90 "Comment" R_0603_1608Metric#3 1377.95,2992.13 r180 bottom
R600 "Comment" R_0603_1608Metric#2 2598.43,2263.78 r180 bottom
R601 "Comment" R_0402_1005Metric#1 2716.54,2263.78 r180 bottom
R602 "Comment" R_0402_1005Metric#2 2814.96,2263.78 r180 bottom
R603 "Comment" R_0402_1005Metric#2 2440.94,2500 r90 bottom
R604 "Comment" R_0402_1005Metric#3 2696.85,2342.52 r90 bottom
R605 "Comment" R_0603_1608Metric#3 2519.68,2421.26 r180 bottom
R800 "Comment" R_0603_1608Metric#1 944.88,2659.45 r180 bottom
R801 "Comment" R_0603_1608Metric#1 944.88,2724.41 r180 bottom
R802 "Comment" R_0603_1608Metric#1 875.98,2604.33 r0 bottom
R803 "Comment" R_0603_1608Metric#1 954.72,2805.12 r90 bottom
R804 "Comment" R_0603_1608Metric#1 1472.44,1649.61 r0 bottom
R805 "Comment" R_0603_1608Metric#1 1496.06,1582.68 r0 bottom
R806 "Comment" R_0603_1608Metric#1 1484.25,1732.28 r0 bottom
R_CAN_SHDN "Comment" R_0603_1608Metric#3 2381.89,1309.06 r90 bottom
R_CAN_STB "Comment" R_0603_1608Metric#1 2401.57,1072.83 r180 bottom
R_CAN_TERM "Comment" R_0603_1608Metric#2 2194.88,1151.57 r270 bottom
R_FRAME_PD "Comment" R_0603_1608Metric#1 2047.24,1781.5 r270 bottom
R_USB_CTS "Comment" R_0402_1005Metric#1 2578.74,1200.79 r180 bottom
R_USB_RESET "Comment" R_0402_1005Metric#1 2657.48,1200.79 r90 bottom
R_USB_VBUS_H "Comment" R_0402_1005Metric#1 2696.85,944.88 r90 bottom
R_USB_VBUS_L "Comment" R_0402_1005Metric#1 2736.22,1161.42 r180 bottom
R_USB_WAKE "Comment" R_0402_1005Metric#1 2775.59,1062.99 r90 bottom
RAD_C1 "Comment" 0603L 915.35,1427.17 r270 top
RAD_C2 "Comment" 0402L 1250,1377.95 r90 top
RAD_C3 "Comment" 0603L 2500,1289.37 r180 top
RAD_C5 "Comment" 0402L 1082.68,1161.42 r90 top
RAD_C6 "Comment" FP-GCJ188C70J475KE02J_0603-MFG 2263.78,905.51 r0 top
RAD_C8 "Comment" FP-GCJ188C70J475KE02J_0603-MFG 2086.61,885.83 r90 top
RAD_C9 "Comment" FP-NFM18HC105C1C3D_0603-MFG 1830.71,1062.99 r90 top
RAD_C10 "Comment" 0603L 803.56,1632.96 r270 top
RAD_C14 "Comment" 0402L 1181.1,1840.55 r180 top
RAD_C15 "Comment" 0805L 1870.08,1181.1 r90 top
RAD_C17 "Comment" 0402L 1692.91,748.03 r270 bottom
RAD_C19 "Comment" 0402L 1535.43,688.98 r0 top
RAD_C21 "Comment" 0402L 738.19,1671.39 r180 top
RAD_C22 "Comment" 0402L 565.97,1921.91 r180 top
RAD_C23 "Comment" 1206_180L 560.97,1861.12 r0 bottom
RAD_C25 "Comment" 1206_180L 560.97,1861.12 r0 top
RAD_C26 "Comment" 1206_180L 560.97,1772.02 r0 bottom
RAD_C29 "Comment" 1206_180L 560.97,1772.02 r0 top
RAD_C31 "Comment" 0805L 2381.89,807.09 r90 top
RAD_C58 "Comment" FP-NFM18HC105C1C3D_0603-MFG 1929.13,787.4 r180 bottom
RAD_C60 "Comment" 0603L 728.35,2224.41 r90 bottom
RAD_C81 "Comment" 0402L 1791.34,787.4 r180 top
RAD_C92 "Comment" 0402L 1161.42,984.25 r270 bottom
RAD_C96 "Comment" 0402L 1377.95,846.46 r90 top
RAD_C99 "Comment" SM_RADIAL_6.3BMM 1259.84,2874.02 r90 top
RAD_C100 "Comment" 1206_180L 807.09,2303.15 r180 top
RAD_C101 "Comment" 1206_180L 807.09,1909.45 r180 top
RAD_C102 "Comment" FP-GRT155R70J105KE01D_0402-MFG 1617.55,1441.52 r0 bottom
RAD_C103 "Comment" FP-GRT155R70J105KE01D_0402-MFG 1519.69,1377.95 r270 bottom
RAD_C104 "Comment" 0603L 748.03,2224.41 r0 top
RAD_C105 "Comment" 0402L 1437.01,787.4 r180 bottom
RAD_C106 "Comment" FP-GCM1555C1H3R9BA16D_0402-MFG 1763.72,1604.37 r0 top
RAD_C107 "Comment" 0402L 1437.01,925.2 r180 top
RAD_C108 "Comment" FP-GCM1555C1H3R9BA16D_0402-MFG 1860.95,1604.58 r180 top
RAD_C110 "Comment" 0805L 1535.43,1003.94 r180 top
RAD_C111 "Comment" 0402L 1299.21,1003.94 r90 top
RAD_C112 "Comment" 0805L 1240.16,1161.42 r90 top
RAD_C113 "Comment" 0402L 1377.95,866.14 r90 bottom
RAD_C114 "Comment" 0805L 1673.23,1003.94 r180 top
RAD_C115 "Comment" 0402L 1220.47,1062.99 r0 top
RAD_C116 "Comment" 0805L 1397.64,1003.94 r180 top
RAD_C117 "Comment" 0402L 1161.42,1161.42 r270 top
RAD_C118 "Comment" FP-CGA4J1X7R1H475K125AC_0805-MFG 657.35,1927.05 r0 top
RAD_C119 "Comment" 0805L 2007.87,767.72 r180 top
RAD_C123 "Comment" 0603L 2047.24,1220.47 r180 top
RAD_C124 "Comment" FP-GCJ188C70J475KE02J_0603-MFG 2165.35,1220.47 r0 top
RAD_C125 "Comment" 0805_155 1948.82,1181.1 r90 top
RAD_C126 "Comment" 0603L 1200.79,1968.5 r270 top
RAD_C129 "Comment" 0805_155 1988.19,846.46 r0 top
RAD_C130 "Comment" 0805_155 1948.82,1023.62 r270 bottom
RAD_C132 "Comment" 0805_155 2145.67,940.94 r90 bottom
RAD_C134 "Comment" 0805_155 1909.45,1043.31 r90 top
RAD_C137 "Comment" 0603L 1594.49,944.88 r0 bottom
RAD_C138 "Comment" 0402L 1240.16,944.88 r180 bottom
RAD_C139 "Comment" 0402L 1279.53,1673.23 r0 top
RAD_C140 "Comment" 0402L 1299.21,866.14 r180 bottom
RAD_C141 "Comment" 0402L 1181.1,1082.68 r270 bottom
RAD_C142 "Comment" 0402L 1358.27,1673.23 r270 top
RAD_C143 "Comment" 0805_155 2362.2,944.88 r270 top
RAD_C144 "Comment" FP-GCJ188C70J475KE02J_0603-MFG 2047.24,1240.16 r0 bottom
RAD_C145 "Comment" 0603L 2677.17,1200.79 r90 top
RAD_C146 "Comment" 0603L 1535.43,925.2 r180 top
RAD_C149 "Comment" 0603L 2618.11,1102.36 r0 top
RAD_C150 "Comment" 0402L 1365.58,1467.11 r180 bottom
RAD_C153 "Comment" FP-GCJ188C70J475KE02J_0603-MFG 2263.78,748.03 r0 top
RAD_C163 "Comment" 0402L 1614.17,846.46 r90 top
RAD_C164 "Comment" 0402L 1535.43,866.14 r0 bottom
RAD_C165 "Comment" 0402L 1338.58,925.2 r180 top
RAD_C168 "Comment" 0402L 1456.69,846.46 r90 top
RAD_C170 "Comment" 0402L 1614.17,866.14 r270 bottom
RAD_C172 "Comment" 0402L 1456.69,866.14 r270 bottom
RAD_C173 "Comment" FP-CGA4J1X7R1H475K125AC_0805-MFG 866.14,2125.98 r270 top
RAD_C174 "Comment" 0402L 1141.73,1062.99 r90 top
RAD_C175 "Comment" 0402L 1712.6,866.14 r90 top
RAD_C176 "Comment" 0402L 1220.47,984.25 r270 top
RAD_C177 "Comment" 0402L 1102.36,1082.68 r90 bottom
RAD_C179 "Comment" FP-NFM18HC105C1C3D_0603-MFG 1677.17,1445.87 r90 bottom
RAD_C180 "Comment" 0402L 1544.71,1441.52 r0 bottom
RAD_C181 "Comment" FP-NFM18HC105C1C3D_0603-MFG 1692.91,925.2 r270 bottom
RAD_C195 "Comment" 0603L 690.2,1828.57 r270 top
RAD_C199 "Comment" 0402L 2460.63,767.72 r270 bottom
RAD_C200 "Comment" 0402L 2165.35,708.66 r180 top
RAD_C201 "Comment" 0805_155 2283.46,826.77 r0 top
RAD_C202 "Comment" 0805_155 2145.67,787.4 r0 top
RAD_L1 "Comment" TFM201610ALMA 2007.87,1062.99 r270 top
RAD_L2 "Comment" "FP-TFM201610ALMAR24MTAA_0806 (2016 Metric)-MFG" 2322.83,1062.99 r270 top
RAD_L5 "Comment" FP-XAL4030-472MEC_SMD2-MFG 1023.62,2480.32 r180 top
RAD_L6 "Comment" FP-XEL4030-222MEC_SMT2_4MM0_4MM0-MFG 596.06,1659.68 r180 top
RAD_L8 "Comment" "FP-TFM201610ALMAR24MTAA_0806 (2016 Metric)-MFG" 2165.35,885.83 r90 top
RAD_L9 "Comment" "FP-TFM201610ALMAR24MTAA_0806 (2016 Metric)-MFG" 2007.87,944.88 r90 top
RAD_NT1 "Comment" Net-Tie_50milWide_30milLong 2500,925.2 r90 bottom net-tie
RAD_NT2 "Comment" Net-Tie_50milWide_30milLong 2500,1200.79 r90 bottom net-tie
RAD_NT3 "Comment" Net-Tie_50milWide_30milLong 2149.61,1006.65 r270 bottom net-tie
RAD_NT4 "Comment" Net-Tie_50milWide_30milLong 2381.89,767.72 r0 bottom net-tie
RAD_P1 "Comment" VPP_SERVICE_SMT_D1p5_P2p5 1850.39,3011.81 r0 top
RAD_R1 "Comment" 0402L 1122.05,1948.82 r180 top
RAD_R2 "Comment" 0402L 807.09,2244.09 r180 bottom
RAD_R7 "Comment" 0402L 748.03,2125.98 r180 bottom
RAD_R9 "Comment" 0402L 748.03,2047.24 r180 bottom
RAD_R13 "Comment" 0402L 1771.65,964.57 r90 top
RAD_R14 "Comment" 0402L 1811.02,866.14 r0 top
RAD_R17 "Comment" 0402L 2066.93,688.98 r180 top
RAD_R26 "Comment" 0402L 1102.36,1673.23 r270 top
RAD_R27 "Comment" 0402L 1692.91,708.66 r0 top
RAD_R29 "Comment" 0402L 925.2,1240.16 r0 top
RAD_R30 "Comment" 1206L 1043.31,944.88 r90 top
RAD_R32 "Comment" 0402L 1535.43,708.66 r0 bottom
RAD_R33 "Comment" 0402L 1614.17,688.98 r90 top
RAD_R35 "Comment" 0402L 1456.69,688.98 r90 top
RAD_R37 "Comment" 0402L 1250,1476.38 r270 top
RAD_R38 "Comment" 0402L 1102.36,1594.49 r180 top
RAD_R39 "Comment" FP-ERJ-1GNF33R2C_0201-MFG 1072.83,1240.16 r90 top
RAD_R40 "Comment" FP-ERJ-1GNF33R2C_0201-MFG 1023.62,1594.49 r90 top
RAD_R41 "Comment" 0402L 1151.57,1240.16 r180 top
RAD_R42 "Comment" FP-ERJ-1GNF33R2C_0201-MFG 915.35,1515.75 r90 top
RAD_R43 "Comment" 0402L 1250,1279.53 r270 top
RAD_R44 "Comment" FP-ERJ-1GNF33R2C_0201-MFG 1003.94,1240.16 r90 top
RAD_R45 "Comment" FP-ERJ-1GNF33R2C_0201-MFG 1334.08,1262.39 r0 bottom
RAD_R47 "Comment" 0402L 1771.65,708.66 r180 bottom
RAD_R49 "Comment" 0402L 1250,1564.96 r270 top
RAD_R56 "Comment" 0402L 984.25,1082.68 r270 top
RAD_R57 "Comment" 0402L 1161.42,807.09 r0 top
RAD_R58 "Comment" 0402L 1062.99,925.2 r90 bottom
RAD_R59 "Comment" 0402L 1259.84,1830.71 r180 top
RAD_R60 "Comment" 1206L 1397.64,708.66 r180 bottom
RAD_R62 "Comment" 0402L 1614.17,669.29 r270 bottom
RAD_R63 "Comment" 0402L 2381.89,688.98 r0 bottom
RAD_R64 "Comment" 1206L 1299.21,748.03 r0 top
RAD_R65 "Comment" 0402L 1072.83,1811.02 r0 top
RAD_R66 "Comment" 0402L 1141.73,826.77 r270 bottom
RAD_R71 "Comment" 0402L 1948.82,708.66 r90 bottom
RAD_R73 "Comment" FP-HCJ0603ZT0R00_0603-MFG 2421.26,846.46 r180 bottom
RAD_R75 "Comment" 0402L 2244.09,669.29 r270 top
RAD_R76 "Comment" 0402L 2539.37,846.46 r0 bottom
RAD_R99 "Comment" 0402L 2519.68,984.25 r180 top
RAD_R104 "Comment" FP-HCJ0603ZT0R00_0603-MFG 2533.46,926.18 r180 top
RAD_R106 "Comment" 0402L 1889.76,767.72 r0 top
RAD_R111 "Comment" FP-HCJ0603ZT0R00_0603-MFG 1889.76,944.88 r0 top
RAD_R116 "Comment" 0402L 2460.63,826.77 r270 top
RAD_R125 "Comment" 0402L 2362.2,708.66 r0 top
RAD_R128 "Comment" 0402L 1744.09,1665.35 r270 top
RAD_R129 "Comment" 0402L 1003.94,1161.42 r180 top
RAD_R186 "Comment" 0402L 2070.87,653.54 r180 top
RAD_R190 "Comment" 0402L 2519.68,1062.99 r180 top
RAD_R193 "Comment" 0402L 1830.71,787.4 r180 bottom
RAD_R200 "Comment" FP-HCJ0603ZT0R00_0603-MFG 1870.08,905.51 r270 bottom
RAD_R218 "Comment" 0201L 1614.17,767.72 r270 top
RAD_R264 "Comment" 0402L 1535.43,767.72 r0 top
RAD_R276 "Comment" 0402L 1200.79,2263.78 r270 top
RAD_R277 "Comment" 0402L 748.03,1968.5 r0 bottom
RAD_R291 "Comment" 0402L 1791.34,866.14 r270 bottom
RAD_R292 "Comment" 0402L 2322.83,1574.8 r270 bottom
RAD_R299 "Comment" 0402L 1062.99,1082.68 r180 top
RAD_R300 "Comment" 0402L 1692.91,787.4 r0 top
RAD_R301 "Comment" 0402L 1338.58,787.4 r180 bottom
RAD_R302 "Comment" 0402L 1220.47,866.14 r90 bottom
RAD_R305 "Comment" 0402L 1614.17,767.72 r90 bottom
RAD_R307 "Comment" 0402L 1299.21,826.77 r180 top
RAD_R309 "Comment" 0402L 1723.43,1154.53 r0 bottom
RAD_R310 "Comment" 0402L 1082.68,1003.94 r0 bottom
RAD_R311 "Comment" 0402L 1181.1,885.83 r0 top
RAD_R313 "Comment" 0402L 1023.62,1122.05 r0 bottom
RAD_R346 "Comment" 1206L 925.2,1220.47 r90 bottom
RAD_R348 "Comment" 0402L 1003.94,1043.31 r90 bottom
RAD_R352 "Comment" 0402L 1240.16,787.4 r180 bottom
RAD_R386 "Comment" 0402L 1141.73,905.51 r180 bottom
RAD_R409 "Comment" 0402L 2598.43,1023.62 r90 top
RAD_TP8 "Comment" TP_25MIL-SMT 1988.19,688.98 r270 top
RAD_U1 "Comment" FP-GD25B64CWAG_WSON8-IPC_C 1082.68,1417.32 r270 top
RAD_U2 "Comment" DRR0012E-MFG 787.4,1791.34 r90 top
RAD_U8 "Comment" RXV0028A-MFG 2165.35,1062.99 r0 top
RAD_U9 "Comment" DGS0010A_L 2421.26,1141.73 r90 top
RAD_U11 "Comment" DGS0010A_L 1988.19,1614.17 r0 bottom
RAD_U12 "Comment" DGS0010A_L 2716.54,1377.95 r270 top
RAD_U22 "Comment" DGS0010A_L 2027.56,1141.73 r180 bottom
RAD_U27 "Comment" DBV0005A-MFG 2559.06,1200.79 r0 top
RAD_U29 "Comment" ALT0266A-MFG 1537.82,1300.78 r270 top
RAD_Y3 "Comment" FP-NX2016SA-50M-STD-CZS-3_SMT4_2MM0_1MM6-MFG 1832.69,1697.35 r0 top
SW1 "Comment" ESwitch_TL3301_GullWing_6x6 2500,1594.49 r180 bottom
TP1 "Comment" TestPoint_Pad_D1.0mm 2992.13,2500 r270 bottom
TP2 "Comment" TestPoint_Pad_D1.0mm 2992.13,2578.74 r180 bottom
TP_RAD_FLASH "Comment" TestPoint_Pad_D1.5mm 1535.43,787.4 r180 bottom
TP_RAD_GND "Comment" TestPoint_Pad_D1.5mm 1023.62,1200.79 r180 bottom
TP_RAD_RESET "Comment" TestPoint_Pad_D1.5mm 2661.42,795.28 r0 top
TP_RAD_VIO "Comment" TestPoint_Pad_D1.5mm 1141.73,964.57 r0 top
U1 "Comment" LQFP-176_24x24mm_P0.5mm 1850.39,2381.89 r90 bottom
U2 "Comment" ICM-42688-P_LGA14_2.5x3mm_P0.5mm 2460.63,2224.41 r0 bottom
U4 "Comment" Texas_DRB0008A 2736.22,1614.17 r90 bottom
U5 "Comment" VQFN-16-1EP_3x3mm_P0.5mm_EP1.68x1.68mm#1 2736.22,1437.01 r270 bottom
U6 "Comment" Texas_RGE0024C_VQFN-24-1EP_4x4mm_P0.5mm_EP2.1x2.1mm 1318.9,1732.28 r0 bottom
U7 "Comment" TPS259470A_RPW0010A_VQFN-HR-10_2x2mm_P0.475mm 1791.34,1771.65 r180 bottom
U8 "Comment" Texas_RNP0030B_WQFN-30-1EP_4x6mm_P0.5mm_EP1.8x4.5mm_ThermalVias 1141.73,2657.48 r90 bottom
U9 "Comment" VQFN-16-1EP_3x3mm_P0.5mm_EP1.68x1.68mm#2 1496.06,3011.81 r180 bottom
U_CAN_RAD "Comment" Texas_DRB0008A 2312.99,1190.94 r90 bottom
U_FRAME "Comment" DCK0005A_N 2175.2,1781.5 r180 bottom
U_USB "Comment" CP2102N_QFN20_3x3_EP_Rev1p5 2559.06,1062.99 r180 bottom
Y1 "Comment" Oscillator_SMD_ECS_2520MV-xxx-xx-4Pin_2.5x2.0mm 1673.23,1771.65 r180 bottom

## Footprints (in the part's own frame and the unit in brackets; to place one, negate y for a bottom-side part, rotate by r counter-clockwise, add the part's x,y. Pads: shape width x height; smd on the part's side, far side on the other; paste and mask are expansions set on the pad)
0201L [mm] "Data from Kemet datasheet CC101_COM dated 7/28/11"
  rect 0.36x0.32 smd mask+0.048: 1(-0.28,0) 2(0.28,0)
  silkscreen extent -0.68,-0.68 0.68,0.68
0402L [mm] "0402 from SM-752 data"
  rect 0.6x0.5 smd: 1(-0.5,0) 2(0.5,0)
  silkscreen extent -0.88,-0.68 0.88,0.68
0603L [mm] "0603 from SM-752 data"
  rect 0.8x0.85 smd: 1(-0.7,0) 2(0.7,0)
  silkscreen extent -1.18,-0.68 1.18,0.68
0805_155 [mm] "SMD, 2-Leads, Body 2x1.25mm"
  rrect12% 0.825x1.55 smd: 1(-0.875,0) 2(0.875,0)
  silkscreen extent -0.35,0.85 0.35,0.85
0805L [mm] "0805 from SM-752 data"
  rect 1.1x1.4 smd: 1(-0.75,0) 2(0.75,0)
1206_180L [mm] "1206_180"
  rect 1.1x1.75 smd: 1(-1.35,0) 2(1.35,0)
1206L [mm] "1206 from SM-752 data"
  rect 1.1x1.75 smd: 1(-1.35,0) 2(1.35,0)
  silkscreen extent -0.64,-0.95 0.64,0.95
ALT0266A-MFG [mm]
  round 0.35 smd paste+0 mask+0.07: A1(-5.525,5.525) A2(-4.875,5.525) A4(-3.575,5.525) A6(-2.275,5.525) A8(-0.975,5.525) A10(0.325,5.525) A11(0.975,5.525) A12(1.625,5.525) A13(2.275,5.525) A14(2.925,5.525) A15(3.575,5.525) A16(4.225,5.525) A17(4.875,5.525) A18(5.525,5.525) B1(-5.525,4.875) B2(-4.875,4.875) B3(-4.225,4.875) B4(-3.575,4.875) B5(-2.925,4.875) B6(-2.275,4.875) B7(-1.625,4.875) B8(-0.975,4.875) B9(-0.325,4.875) B10(0.325,4.875) B11(0.975,4.875) B12(1.625,4.875) B13(2.275,4.875) B14(2.925,4.875) B15(3.575,4.875) B16(4.225,4.875) B17(4.875,4.875) B18(5.525,4.875) C1(-5.525,4.225) C2(-4.875,4.225) C3(-4.225,4.225) C4(-3.575,4.225) C5(-2.925,4.225) C6(-2.275,4.225) C7(-1.625,4.225) C8(-0.975,4.225) C9(-0.325,4.225) C10(0.325,4.225) C11(0.975,4.225) C12(1.625,4.225) C14(2.925,4.225) C16(4.225,4.225) C17(4.875,4.225) C18(5.525,4.225) D1(-5.525,3.575) D2(-4.875,3.575) D3(-4.225,3.575) D6(-2.275,3.575) D7(-1.625,3.575) D9(-0.325,3.575) D11(0.975,3.575) D13(2.275,3.575) D15(3.575,3.575) D16(4.225,3.575) D17(4.875,3.575) D18(5.525,3.575) E1(-5.525,2.925) E2(-4.875,2.925) E3(-4.225,2.925) E4(-3.575,2.925) E11(0.975,2.925) E12(1.625,2.925) E13(2.275,2.925) E14(2.925,2.925) E15(3.575,2.925) E17(4.875,2.925) E18(5.525,2.925) F2(-4.875,2.275) F3(-4.225,2.275) F6(-2.275,2.275) F7(-1.625,2.275) F8(-0.975,2.275) F9(-0.325,2.275) F10(0.325,2.275) F11(0.975,2.275) F12(1.625,2.275) F13(2.275,2.275) F14(2.925,2.275) F16(4.225,2.275) F17(4.875,2.275) F18(5.525,2.275) G1(-5.525,1.625) G2(-4.875,1.625) G3(-4.225,1.625) G4(-3.575,1.625) G6(-2.275,1.625) G7(-1.625,1.625) G8(-0.975,1.625) G9(-0.325,1.625) G10(0.325,1.625) G11(0.975,1.625) G12(1.625,1.625) G13(2.275,1.625) G14(2.925,1.625) G15(3.575,1.625) G17(4.875,1.625) G18(5.525,1.625) H2(-4.875,0.975) H3(-4.225,0.975) H4(-3.575,0.975) H6(-2.275,0.975) H7(-1.625,0.975) H8(-0.975,0.975) H9(-0.325,0.975) H10(0.325,0.975) H11(0.975,0.975) H12(1.625,0.975) H13(2.275,0.975) H14(2.925,0.975) H16(4.225,0.975) H17(4.875,0.975) H18(5.525,0.975) J1(-5.525,0.325) J2(-4.875,0.325) J3(-4.225,0.325) J6(-2.275,0.325) J7(-1.625,0.325) J8(-0.975,0.325) J9(-0.325,0.325) J10(0.325,0.325) J11(0.975,0.325) J12(1.625,0.325) J13(2.275,0.325) J14(2.925,0.325) J15(3.575,0.325) J17(4.875,0.325) J18(5.525,0.325) K2(-4.875,-0.325) K3(-4.225,-0.325) K4(-3.575,-0.325) K6(-2.275,-0.325) K7(-1.625,-0.325) K8(-0.975,-0.325) K9(-0.325,-0.325) K10(0.325,-0.325) K11(0.975,-0.325) K12(1.625,-0.325) K13(2.275,-0.325) K14(2.925,-0.325) K16(4.225,-0.325) K17(4.875,-0.325) K18(5.525,-0.325) L1(-5.525,-0.975) L2(-4.875,-0.975) L3(-4.225,-0.975) L6(-2.275,-0.975) L7(-1.625,-0.975) L8(-0.975,-0.975) L9(-0.325,-0.975) L10(0.325,-0.975) L11(0.975,-0.975) L12(1.625,-0.975) L13(2.275,-0.975) L14(2.925,-0.975) L15(3.575,-0.975) L17(4.875,-0.975) L18(5.525,-0.975) M2(-4.875,-1.625) M3(-4.225,-1.625) M4(-3.575,-1.625) M6(-2.275,-1.625) M7(-1.625,-1.625) M8(-0.975,-1.625) M9(-0.325,-1.625) M10(0.325,-1.625) M11(0.975,-1.625) M12(1.625,-1.625) M13(2.275,-1.625) M14(2.925,-1.625) M16(4.225,-1.625) M17(4.875,-1.625) M18(5.525,-1.625) N1(-5.525,-2.275) N2(-4.875,-2.275) N3(-4.225,-2.275) N6(-2.275,-2.275) N7(-1.625,-2.275) N8(-0.975,-2.275) N9(-0.325,-2.275) N10(0.325,-2.275) N11(0.975,-2.275) N12(1.625,-2.275) N13(2.275,-2.275) N14(2.925,-2.275) N15(3.575,-2.275) N17(4.875,-2.275) N18(5.525,-2.275) P1(-5.525,-2.925) P2(-4.875,-2.925) P3(-4.225,-2.925) P6(-2.275,-2.925) P7(-1.625,-2.925) P8(-0.975,-2.925) P9(-0.325,-2.925) P10(0.325,-2.925) P11(0.975,-2.925) P12(1.625,-2.925) P13(2.275,-2.925) P14(2.925,-2.925) P16(4.225,-2.925) P17(4.875,-2.925) P18(5.525,-2.925) R1(-5.525,-3.575) R2(-4.875,-3.575) R3(-4.225,-3.575) R4(-3.575,-3.575) R6(-2.275,-3.575) R8(-0.975,-3.575) R10(0.325,-3.575) R12(1.625,-3.575) R14(2.925,-3.575) R15(3.575,-3.575) R17(4.875,-3.575) R18(5.525,-3.575) T1(-5.525,-4.225) T2(-4.875,-4.225) T3(-4.225,-4.225) T5(-2.925,-4.225) T7(-1.625,-4.225) T9(-0.325,-4.225) T11(0.975,-4.225) T13(2.275,-4.225) T15(3.575,-4.225) T16(4.225,-4.225) T17(4.875,-4.225) T18(5.525,-4.225) U1(-5.525,-4.875) U2(-4.875,-4.875) U3(-4.225,-4.875) U4(-3.575,-4.875) U5(-2.925,-4.875) U6(-2.275,-4.875) U7(-1.625,-4.875) U8(-0.975,-4.875) U9(-0.325,-4.875) U10(0.325,-4.875) U11(0.975,-4.875) U12(1.625,-4.875) U13(2.275,-4.875) U14(2.925,-4.875) U15(3.575,-4.875) U16(4.225,-4.875) U17(4.875,-4.875) U18(5.525,-4.875) V1(-5.525,-5.525) V2(-4.875,-5.525) V3(-4.225,-5.525) V4(-3.575,-5.525) V5(-2.925,-5.525) V6(-2.275,-5.525) V7(-1.625,-5.525) V8(-0.975,-5.525) V9(-0.325,-5.525) V10(0.325,-5.525) V11(0.975,-5.525) V12(1.625,-5.525) V13(2.275,-5.525) V14(2.925,-5.525) V15(3.575,-5.525) V16(4.225,-5.525) V17(4.875,-5.525) V18(5.525,-5.525)
  silkscreen extent -6.08,-6.08 6.08,6.08
C_0402_1005Metric#1 [mm]
  rrect25% 0.56x0.62 smd: 1(-0.48,0)
  rrect50% 0.56x0.62 smd: 2(0.48,0)
  silkscreen extent -0.84,-0.68 0.84,0.68
C_0402_1005Metric#2 [mm]
  rrect50% 0.62x0.56 smd: 1(0,0.48) 2(0,-0.48)
  silkscreen extent -0.68,-0.84 0.68,0.84
C_0603_1608Metric#1 [mm]
  rrect25% 0.9x0.95 smd: 1(-0.775,0)
  rrect50% 0.9x0.95 smd: 2(0.775,0)
  silkscreen extent -1.31,-0.68 1.3,0.68
C_0603_1608Metric#2 [mm]
  rrect50% 0.95x0.9 smd: 1(0,-0.775) 2(0,0.775)
  silkscreen extent -0.68,-1.3 0.68,1.31
C_0805_2012Metric [mm]
  rrect25% 1x1.45 smd: 1(-0.95,0)
  rrect50% 1x1.45 smd: 2(0.95,0)
  silkscreen extent -0.38,-0.8 0.46,0.8
C_1206_3216Metric#1 [mm]
  rrect22% 1.15x1.8 smd: 1(-1.475,0)
  rrect50% 1.15x1.8 smd: 2(1.475,0)
  silkscreen extent -0.83,-0.98 0.94,0.98
C_1206_3216Metric#2 [mm]
  rrect50% 1.8x1.15 smd: 1(0,-1.475) 2(0,1.475)
  silkscreen extent -0.98,-0.94 0.98,0.94
C_1206_3216Metric#3 [mm]
  rrect50% 1.8x1.15 smd: 1(0.68,3.495) 2(0.68,6.445)
  silkscreen extent -0.68,-0.68 1.66,7.1
C_1210_3225Metric [mm]
  rrect22% 1.15x2.7 smd mask+0: 1(-1.475,0)
  rrect50% 1.15x2.7 smd mask+0: 2(1.475,0)
  silkscreen extent -0.83,-1.43 0.94,1.43
Coilcraft_XFL4020_4x4 [mm]
  rect 0.98x3.4 smd: 1(-1.185,0) 2(1.185,0)
  silkscreen extent -2.28,-2.28 2.28,2.28
CONN_105017-0001 [mm] "Molex Micro USB-B"
  rect 0.4x1.35 smd: 1(-1.3,1.35) 2(-0.65,1.35) 3(0,1.35) 4(0.65,1.35) 5(1.3,1.35)
  oval 1.2x1.9 hole 0.6 slot 1.3 at 0 deg: 6(-3.5,-1.35) 9(3.5,-1.35)
  rect 1.5x1.9 smd: 7(-1,-1.35) 8(1,-1.35)
  round 1.45 hole 0.85: 10(2.5,1.35) 11(-2.5,1.35)
  silkscreen extent -4.18,-3.78 4.18,3.78
CP2102N_QFN20_3x3_EP_Rev1p5 [mm]
  rect 0.3x0.3 smd: 1(-1.25,1.25) 6(-1.25,-1.25) 11(1.25,-1.25) 16(1.25,1.25)
  rect 0.9x0.3 smd: 2(-1.55,0.75) 3(-1.55,0.25) 4(-1.55,-0.25) 5(-1.55,-0.75) 12(1.55,-0.75) 13(1.55,-0.25) 14(1.55,0.25) 15(1.55,0.75)
  rect 0.3x0.9 smd: 7(-0.75,-1.55) 8(-0.25,-1.55) 9(0.25,-1.55) 10(0.75,-1.55) 17(0.75,1.55) 18(0.25,1.55) 19(-0.25,1.55) 20(-0.75,1.55)
  rect 1.8x1.8 smd paste+0: 21(0,0)
  rect 0.75x0.75 on Bottom Paste: P1(-0.475,-0.475) P2(-0.475,0.475) P3(0.475,-0.475) P4(0.475,0.475)
  silkscreen extent -2.08,-2.08 2.08,2.08
D_SMC [mm]
  rrect10% 2.5x3.3 smd mask+0: 1(-3.4,0)
  rrect50% 2.5x3.3 smd mask+0: 2(3.4,0)
  silkscreen extent -4.73,-3.38 4.73,3.38
DBV0005A-MFG [mm]
  rrect17% 1.1x0.6 smd paste+0 mask+0: 1(-1.3,0.95) 2(-1.3,0) 3(-1.3,-0.95) 4(1.3,-0.95) 5(1.3,0.95)
  silkscreen extent -0.64,-1.33 1.93,1.33
DCK0005A_N [mm] "SOT353, 5-Leads, Body 2x1.3mm, Pitch 0.65mm, Lead Span 2.1mm, IPC Medium Density"
  rrect25% 0.85x0.4 smd: 1(-1.125,0.65) 2(-1.125,0) 3(-1.125,-0.65) 4(1.125,-0.65) 5(1.125,0.65)
  silkscreen extent -0.59,-0.93 1.63,0.93
DGS0010A_L [mm] "TSSOP, 10-Leads, Body 3x3mm, Pitch 0.5mm, IPC High Density"
  oval 1.15x0.25 smd: 1(-2.125,1) 2(-2.125,0.5) 3(-2.125,0) 4(-2.125,-0.5) 5(-2.125,-1) 6(2.125,-1) 7(2.125,-0.5) 8(2.125,0) 9(2.125,0.5) 10(2.125,1)
  silkscreen extent -1.48,-1.21 1.48,1.2
DRR0012E-MFG [mm]
  rrect40% 0.62x0.25 smd paste+0 mask+0: 1(-1.39,1.25) 2(-1.39,0.75) 3(-1.39,0.25) 4(-1.39,-0.25) 5(-1.39,-0.75) 6(-1.39,-1.25) 7(1.39,-1.25) 8(1.39,-0.75) 9(1.39,-0.25) 10(1.39,0.25) 11(1.39,0.75) 12(1.39,1.25)
  rrect8% 1.3x2.5 smd paste-1000 mask+0: 13(0,0)
ESwitch_TL3301_GullWing_6x6 [mm] "E-Switch TL3301 series, 6 x 6 mm gull-wing tactile switch"
  rect 1.4x2.1 smd: 1(2.25,-4.55) 1(2.25,4.55) 2(-2.25,-4.55) 2(-2.25,4.55)
  silkscreen extent -3.38,-5.68 3.38,5.68
FP-CGA4J1X7R1H475K125AC_0805-MFG [mm]
  rrect13% 0.8x1.05 smd paste+0 mask+0: 1(-0.925,0) 2(0.925,0)
FP-ERJ-1GNF33R2C_0201-MFG [mm]
  rrect40% 0.25x0.3 smd paste+0 mask+0: 1(-0.3,0) 2(0.3,0)
  silkscreen extent -0.68,-0.68 0.68,0.68
FP-GCJ188C70J475KE02J_0603-MFG [mm]
  rrect13% 0.75x0.9 smd paste+0 mask+0: 1(-0.775,0) 2(0.775,0)
  silkscreen extent -1.23,-0.68 1.23,0.68
FP-GCM1555C1H3R9BA16D_0402-MFG [mm]
  rrect25% 0.4x0.5 smd paste+0 mask+0: 1(-0.4,0) 2(0.4,0)
  silkscreen extent -0.68,-0.68 0.68,0.68
FP-GD25B64CWAG_WSON8-IPC_C [mm]
  rrect23% 1.059x0.436 smd paste+0 mask+0: 1(-2.727,1.905)
  rrect100% 1.059x0.436 smd paste+0 mask+0: 2(-2.727,0.635) 3(-2.727,-0.635) 4(-2.727,-1.905) 5(2.727,-1.905) 6(2.727,-0.635) 7(2.727,0.635) 8(2.727,1.905)
  rrect3% 3.5x4.1 smd paste-1000 mask+0: 9(0,0)
  silkscreen extent -3.34,-3.08 3.34,3.08
FP-GRT155R70J105KE01D_0402-MFG [mm]
  rrect25% 0.4x0.5 smd paste+0 mask+0: 1(-0.4,0) 2(0.4,0)
  silkscreen extent -0.68,-0.68 0.68,0.68
FP-HCJ0603ZT0R00_0603-MFG [mm]
  rrect11% 1.3x0.92 smd paste+0 mask+0: 1(-0.95,0) 2(0.95,0)
  silkscreen extent -1.49,-0.68 1.68,0.68
FP-NFM18HC105C1C3D_0603-MFG [mm]
  rrect17% 0.6x0.7 smd paste+0 mask+0: 1(-0.8,0) 3(0.8,0)
  rrect25% 0.4x0.4 smd paste+0 mask+0: 2(0,0.4) 2(0,-0.4)
  silkscreen extent -1.18,-0.68 1.18,0.68
FP-NX2016SA-50M-STD-CZS-3_SMT4_2MM0_1MM6-MFG [mm]
  rrect13% 0.85x0.75 smd paste+0 mask+0: 1(-0.675,-0.525) 2(0.675,-0.525) 3(0.675,0.525) 4(-0.675,0.525)
  silkscreen extent -0.14,-0.98 0.14,0.98
"FP-TFM201610ALMAR24MTAA_0806 (2016 Metric)-MFG" [mm]
  rrect17% 0.6x1.6 smd paste+0 mask+0: 1(-0.9,0) 2(0.9,0)
  silkscreen extent -0.49,-0.88 0.49,0.88
FP-XAL4030-472MEC_SMD2-MFG [mm]
  rrect10% 0.98x3.4 smd paste+0 mask+0: 1(-1.185,0) 2(1.185,0)
  silkscreen extent -0.58,-1.78 0.58,1.78
FP-XEL4030-222MEC_SMT2_4MM0_4MM0-MFG [mm]
  rrect10% 0.98x3.4 smd paste+0 mask+0: 1(-1.185,0) 2(1.185,0)
ICM-42688-P_LGA14_2.5x3mm_P0.5mm [mm]
  rect 0.475x0.25 smd: 1(-1.012,-0.75) 2(-1.012,-0.25) 3(-1.012,0.25) 4(-1.012,0.75) 8(1.012,0.75) 9(1.012,0.25) 10(1.012,-0.25) 11(1.012,-0.75)
  rect 0.25x0.475 smd: 5(-0.5,1.262) 6(0,1.262) 7(0.5,1.262) 12(0.5,-1.262) 13(0,-1.262) 14(-0.5,-1.262)
  silkscreen extent -1.33,-1.58 1.33,1.58
JST_GH_SM06B-GHS-TB_1x06-1MP_P1.25mm_Horizontal [mm]
  rrect50% 1.7x0.6 smd: 1(-1.85,-3.125) 2(-1.85,-1.875) 3(-1.85,-0.625) 4(-1.85,0.625) 5(-1.85,1.875) 6(-1.85,3.125)
  rrect50% 2.7x1 smd: MP(1.35,-4.975) MP(1.35,4.975)
  silkscreen extent -3.28,-5.68 3.58,5.68
L_0603_1608Metric [mm]
  rrect25% 0.875x0.95 smd: 1(-0.787,0)
  rrect50% 0.875x0.95 smd: 2(0.787,0)
  silkscreen extent -1.3,-0.68 1.3,0.68
L_Coilcraft_XAL7070-XXX [mm]
  rrect13% 1.92x6.5 smd mask+0: 1(-2.41,0)
  rrect50% 1.92x6.5 smd mask+0: 2(2.41,0)
  silkscreen extent -3.78,-3.78 3.78,3.78
LQFP-176_24x24mm_P0.5mm [mm]
  rrect25% 1.5x0.3 smd: 1(-12.675,10.75) 2(-12.675,10.25) 3(-12.675,9.75) 4(-12.675,9.25) 5(-12.675,8.75) 6(-12.675,8.25) 7(-12.675,7.75) 8(-12.675,7.25) 9(-12.675,6.75) 10(-12.675,6.25) 11(-12.675,5.75) 12(-12.675,5.25) 13(-12.675,4.75) 14(-12.675,4.25) 15(-12.675,3.75) 16(-12.675,3.25) 17(-12.675,2.75) 18(-12.675,2.25) 19(-12.675,1.75) 20(-12.675,1.25) 21(-12.675,0.75) 22(-12.675,0.25) 23(-12.675,-0.25) 24(-12.675,-0.75) 25(-12.675,-1.25) 26(-12.675,-1.75) 27(-12.675,-2.25) 28(-12.675,-2.75) 29(-12.675,-3.25) 30(-12.675,-3.75) 31(-12.675,-4.25) 32(-12.675,-4.75) 33(-12.675,-5.25) 34(-12.675,-5.75) 35(-12.675,-6.25) 36(-12.675,-6.75) 37(-12.675,-7.25) 38(-12.675,-7.75) 39(-12.675,-8.25) 40(-12.675,-8.75) 41(-12.675,-9.25) 42(-12.675,-9.75) 43(-12.675,-10.25) 44(-12.675,-10.75) 89(12.675,-10.75) 90(12.675,-10.25) 91(12.675,-9.75) 92(12.675,-9.25) 93(12.675,-8.75) 94(12.675,-8.25) 95(12.675,-7.75) 96(12.675,-7.25) 97(12.675,-6.75) 98(12.675,-6.25) 99(12.675,-5.75) 100(12.675,-5.25) 101(12.675,-4.75) 102(12.675,-4.25) 103(12.675,-3.75) 104(12.675,-3.25) 105(12.675,-2.75) 106(12.675,-2.25) 107(12.675,-1.75) 108(12.675,-1.25) 109(12.675,-0.75) 110(12.675,-0.25) 111(12.675,0.25) 112(12.675,0.75) 113(12.675,1.25) 114(12.675,1.75) 115(12.675,2.25) 116(12.675,2.75) 117(12.675,3.25) 118(12.675,3.75) 119(12.675,4.25) 120(12.675,4.75) 121(12.675,5.25) 122(12.675,5.75) 123(12.675,6.25) 124(12.675,6.75) 125(12.675,7.25) 126(12.675,7.75) 127(12.675,8.25) 128(12.675,8.75) 129(12.675,9.25) 130(12.675,9.75) 131(12.675,10.25) 132(12.675,10.75)
  rrect25% 0.3x1.5 smd: 45(-10.75,-12.675) 46(-10.25,-12.675) 47(-9.75,-12.675) 48(-9.25,-12.675) 49(-8.75,-12.675) 50(-8.25,-12.675) 51(-7.75,-12.675) 52(-7.25,-12.675) 53(-6.75,-12.675) 54(-6.25,-12.675) 55(-5.75,-12.675) 56(-5.25,-12.675) 57(-4.75,-12.675) 58(-4.25,-12.675) 59(-3.75,-12.675) 60(-3.25,-12.675) 61(-2.75,-12.675) 62(-2.25,-12.675) 63(-1.75,-12.675) 64(-1.25,-12.675) 65(-0.75,-12.675) 66(-0.25,-12.675) 67(0.25,-12.675) 68(0.75,-12.675) 69(1.25,-12.675) 70(1.75,-12.675) 71(2.25,-12.675) 72(2.75,-12.675) 73(3.25,-12.675) 74(3.75,-12.675) 75(4.25,-12.675) 76(4.75,-12.675) 77(5.25,-12.675) 78(5.75,-12.675) 79(6.25,-12.675) 80(6.75,-12.675) 81(7.25,-12.675) 82(7.75,-12.675) 83(8.25,-12.675) 84(8.75,-12.675) 85(9.25,-12.675) 86(9.75,-12.675) 87(10.25,-12.675) 88(10.75,-12.675) 133(10.75,12.675) 134(10.25,12.675) 135(9.75,12.675) 136(9.25,12.675) 137(8.75,12.675) 138(8.25,12.675) 139(7.75,12.675) 140(7.25,12.675) 141(6.75,12.675) 142(6.25,12.675) 143(5.75,12.675) 144(5.25,12.675) 145(4.75,12.675) 146(4.25,12.675) 147(3.75,12.675) 148(3.25,12.675) 149(2.75,12.675) 150(2.25,12.675) 151(1.75,12.675) 152(1.25,12.675) 153(0.75,12.675) 154(0.25,12.675) 155(-0.25,12.675) 156(-0.75,12.675) 157(-1.25,12.675) 159(-2.25,12.675) 160(-2.75,12.675) 161(-3.25,12.675) 162(-3.75,12.675) 163(-4.25,12.675) 164(-4.75,12.675) 165(-5.25,12.675) 166(-5.75,12.675) 167(-6.25,12.675) 168(-6.75,12.675) 169(-7.25,12.675) 170(-7.75,12.675) 171(-8.25,12.675) 172(-8.75,12.675) 173(-9.25,12.675) 174(-9.75,12.675) 175(-10.25,12.675) 176(-10.75,12.675)
  rrect50% 0.3x1.5 smd: 158(-1.75,12.675)
  silkscreen extent -13.5,-13.5 13.5,13.5
Molex_43045-0600_RA_THT_6P [mm]
  rrect50% 1.5x1.5 hole 1.02: 1(0,0)
  round 1.5 hole 1.02: 2(3,0) 3(6,0) 4(0,-3) 5(3,-3) 6(6,-3)
  round 3 hole 3: Un1(3,4.32)
  silkscreen extent -3.4,-4.08 9.4,9
Molex_43650-0200_RA_THT_2P [mm]
  rrect17% 1.5x2.02 hole 1.02: 1(0,0)
  rrect50% 1.5x2.02 hole 1.02: 2(3,0)
  round 3 hole 3: Un1(1.5,4.32)
  silkscreen extent -3.4,-1.09 6.4,9
Net-Tie_50milWide_30milLong [mil] "50mil net tie, no solder mask opening, no solder paste"
  rect 30x50 smd paste-20 mask-20: 1(-15,0) 2(15,0)
Oscillator_SMD_ECS_2520MV-xxx-xx-4Pin_2.5x2.0mm [mm]
  rrect25% 0.8x0.9 smd: 1(-0.725,0.925) 3(0.725,-0.925) 4(0.725,0.925)
  rrect50% 0.8x0.9 smd: 2(-0.725,-0.925)
  silkscreen extent -1.33,-1.45 1.33,1.46
R_0402_1005Metric#1 [mm]
  rrect50% 0.54x0.64 smd: 1(-0.51,0) 2(0.51,0)
  silkscreen extent -0.86,-0.68 0.86,0.68
R_0402_1005Metric#2 [mm]
  rrect50% 0.54x0.64 smd: 1(-0.51,0)
  rrect25% 0.54x0.64 smd: 2(0.51,0)
  silkscreen extent -0.86,-0.68 0.86,0.68
R_0402_1005Metric#3 [mm]
  rrect25% 0.54x0.64 smd: 1(-0.51,0)
  rrect50% 0.54x0.64 smd: 2(0.51,0)
  silkscreen extent -0.86,-0.68 0.86,0.68
R_0603_1608Metric#1 [mm]
  rrect25% 0.8x0.95 smd: 1(-0.825,0)
  rrect50% 0.8x0.95 smd: 2(0.825,0)
  silkscreen extent -1.31,0.5 1.3,0.68
R_0603_1608Metric#2 [mm]
  rrect50% 0.8x0.95 smd: 1(-0.825,0)
  rrect25% 0.8x0.95 smd: 2(0.825,0)
  silkscreen extent -1.31,-0.68 1.3,0.68
R_0603_1608Metric#3 [mm]
  rrect50% 0.95x0.8 smd: 1(0,-0.825) 2(0,0.825)
  silkscreen extent -0.68,-1.3 0.68,1.31
R_0603_1608Metric#4 [mm]
  rrect50% 0.8x0.95 smd: 1(-0.825,0) 2(0.825,0)
  silkscreen extent -1.3,-0.68 1.31,0.68
RXV0028A-MFG [mm]
  round 0.195 smd paste+0 mask+0: 1(-1.573,2.03) 9(-1.573,-2.03)
  rrect40% 0.8x0.25 smd paste+0 mask+0: 2(-2.05,1.5) 8(-2.05,-1.5) 16(2.05,-1.5) 22(2.05,1.5)
  rrect40% 0.725x0.25 smd paste+0 mask+0: 3(-2.087,1) 7(-2.087,-1) 17(2.087,-1) 21(2.087,1)
  rrect40% 0.85x0.25 smd paste+0 mask+0: 4(-2.025,0.5) 6(-2.025,-0.5) 18(2.025,-0.5) 20(2.025,0.5)
  rrect40% 0.6x0.25 smd paste+0 mask+0: 5(-1.95,0) 5-19(0,0) 19(1.95,0)
  rrect40% 0.25x1.175 smd paste+0 mask+0: 10(-1,-2.113) 14(1,-2.113) 24(1,2.113) 28(-1,2.113)
  rrect40% 0.25x1.55 smd paste-1000 mask+0: 11(-0.5,-1.925) 13(0.5,-1.925) 25(0.5,1.925) 27(-0.5,1.925)
  rrect40% 0.25x1.9 smd paste-1000 mask+0: 12(0,-1.75) 26(0,1.75)
  round 0.243 smd paste+0 mask+0: 15(1.53,-2.03) 23(1.53,2.03)
  silkscreen extent -2.58,-2.78 2.58,2.78
SM_RADIAL_6.3BMM [mm] "Nichicon 6.3x7.7"
  rect 3.5x1.6 smd: 1(-2.7,0) 2(2.7,0)
  silkscreen extent -0.79,-0.88 0.79,0.88
SOT-23 [mm] "JEDEC TO-236 AB, three-pad SOT-23"
  rect 1.475x0.6 smd: 1(-0.937,-0.95) 2(-0.937,0.95) 3(0.937,0)
  silkscreen extent -1.75,-1.33 1.76,1.33
TagConnect_TC2030_NL [mil]
  round 31 smd: 1(-50,-25) 2(-50,25) 3(0,-25) 4(0,25) 5(50,-25) 6(50,25)
  round 39 hole 39: Un1(-100,0) Un2(100,40) Un3(100,-40)
  silkscreen extent -123,-63 123,63
TestPoint_Pad_D1.0mm [mm]
  round 1 smd: 1(0,0)
  silkscreen extent -0.68,-0.68 0.68,0.68
TestPoint_Pad_D1.5mm [mm]
  round 1.5 smd paste+0: 1(0,0)
  silkscreen extent -0.83,-0.83 0.83,0.83
Texas_DRB0008A [mm]
  rrect50% 0.6x0.31 smd: 1(-1.4,0.975) 2(-1.4,0.325) 3(-1.4,-0.325) 4(-1.4,-0.975) 5(1.4,-0.975) 6(1.4,-0.325) 7(1.4,0.325) 8(1.4,0.975)
  round 0.5 hole 0.2: 9(-0.5,0) 9(0,-0.625) 9(0,0.625) 9(0.5,0)
  rrect50% 0.23x1.025 smd: 9(-0.325,-1.188) 9(-0.325,1.188) 9(0.325,-1.188) 9(0.325,1.188)
  rrect50% 1.5x1.75 smd: 9(0,0)
  rrect50% 1.5x1.75 smd far side: 9(0,0)
  rrect50% 0.23x0.725 on Bottom Paste: Un1(-0.325,1.337) Un2(-0.325,-1.337) Un4(0.325,1.337) Un5(0.325,-1.337)
  rrect50% 1.34x1.55 on Bottom Paste: Un3(0,0)
  silkscreen extent -1.78,-1.78 1.78,1.78
Texas_RGE0024C_VQFN-24-1EP_4x4mm_P0.5mm_EP2.1x2.1mm [mm]
  rrect25% 0.875x0.25 smd mask+0: 1(-1.937,1.25) 2(-1.937,0.75) 3(-1.937,0.25) 4(-1.937,-0.25) 5(-1.937,-0.75) 6(-1.937,-1.25) 13(1.937,-1.25) 14(1.937,-0.75) 15(1.937,-0.25) 16(1.937,0.25) 17(1.937,0.75) 18(1.937,1.25)
  rrect25% 0.25x0.875 smd mask+0: 7(-1.25,-1.937) 8(-0.75,-1.937) 9(-0.25,-1.937) 10(0.25,-1.937) 11(0.75,-1.937) 12(1.25,-1.937) 19(1.25,1.937) 20(0.75,1.937) 21(0.25,1.937) 22(-0.25,1.937) 23(-0.75,1.937) 24(-1.25,1.937)
  rect 2.1x2.1 smd paste-2.1 mask+0: 25(0,0)
  rrect50% 0.85x0.85 on Bottom Paste mask-0.85: Un1(-0.525,0.525) Un2(-0.525,-0.525) Un3(0.525,0.525) Un4(0.525,-0.525)
  silkscreen extent -2.45,-2.45 2.45,2.45
Texas_RNP0030B_WQFN-30-1EP_4x6mm_P0.5mm_EP1.8x4.5mm_ThermalVias [mm]
  rrect25% 1.025x0.25 smd mask+0: 1(-1.863,2.5) 2(-1.863,2) 3(-1.863,1.5) 4(-1.863,1) 5(-1.863,0.5) 6(-1.863,0) 7(-1.863,-0.5) 8(-1.863,-1) 9(-1.863,-1.5) 10(-1.863,-2) 11(-1.863,-2.5) 16(1.863,-2.5) 17(1.863,-2) 18(1.863,-1.5) 19(1.863,-1) 20(1.863,-0.5) 21(1.863,0) 22(1.863,0.5) 23(1.863,1) 24(1.863,1.5) 25(1.863,2) 26(1.863,2.5)
  rrect25% 0.25x0.775 smd mask+0: 12(-0.75,-2.987) 13(-0.25,-2.987) 14(0.25,-2.987) 15(0.75,-2.987) 27(0.75,2.987) 28(0.25,2.987) 29(-0.25,2.987) 30(-0.75,2.987)
  round 0.5 hole 0.2 paste-2539.97 mask-0.5: 31(-0.65,-2) 31(-0.65,-1) 31(-0.65,0) 31(-0.65,1) 31(-0.65,2) 31(0,-2) 31(0,-1) 31(0,0) 31(0,1) 31(0,2) 31(0.65,-2) 31(0.65,-1) 31(0.65,0) 31(0.65,1) 31(0.65,2)
  rect 1.8x4.5 smd paste-4.5 mask+0: 31(0,0)
  rect 1.8x4.5 smd far side paste-4.5 mask-4.5: 31(0,0)
  rrect50% 0.78x0.97 on Bottom Paste mask-0.97: Un1(-0.45,1.68) Un2(-0.45,0.56) Un3(-0.45,-0.56) Un4(-0.45,-1.68) Un5(0.45,1.68) Un6(0.45,0.56) Un7(0.45,-0.56) Un8(0.45,-1.68)
  silkscreen extent -2.46,-3.45 2.45,3.45
TFM201610ALMA [mm] "TDK"
  rrect17% 0.6x1.6 smd: 1(-0.9,0) 2(0.9,0)
  silkscreen extent -0.49,-0.88 0.49,0.88
TP_25MIL-SMT [mil]
  round 25 smd paste-25 mask-2.5: 1(0,0)
  silkscreen extent -27,-27 27,27
TPS259470A_RPW0010A_VQFN-HR-10_2x2mm_P0.475mm [mm]
  round 0.25 smd: 1(-0.725,0.875) 4(-0.725,-0.875) 7(0.725,-0.875) 10(0.725,0.875)
  rrect17% 0.6x0.3 smd: 2(-0.9,0.225) 3(-0.9,-0.225) 9(0.9,0.225)
  rrect17% 0.3x2.4 smd: 5(-0.25,0) 6(0.25,0)
  rrect50% 0.6x0.3 smd: 8(0.9,-0.225)
  rrect17% 0.3x1.05 on Bottom Paste: Un1(-0.25,0.675) Un2(-0.25,-0.675) Un3(0.25,0.675) Un4(0.25,-0.675)
  silkscreen extent -1.28,-1.28 1.28,1.28
USON-10_2.5x1.0mm_P0.5mm [mm]
  rrect50% 0.55x0.3 smd: 1(-0.385,1) 2(-0.385,0.5) 3(-0.385,0) 4(-0.385,-0.5) 5(-0.385,-1) 6(0.385,-1) 7(0.385,-0.5) 8(0.385,0) 9(0.385,0.5) 10(0.385,1)
  silkscreen extent -1.33,-1.23 1.33,1.23
VPP_SERVICE_SMT_D1p5_P2p5 [mm]
  round 1.5 smd paste+0: 1(-1.25,0) 2(1.25,0)
  silkscreen extent -2.08,-0.83 2.08,0.83